# Altium PCB Turret.PcbDoc
Units mm, origin at the board's own origin, x right, y up, seen from the top; angles counter-clockwise.
Board outline 80 x 80 mm, 4 copper layers (Top Layer, Layer 1, Layer 2, Bottom Layer), stack 1.564 mm thick; 100 components, 62 nets, 314 pads, 133 vias.
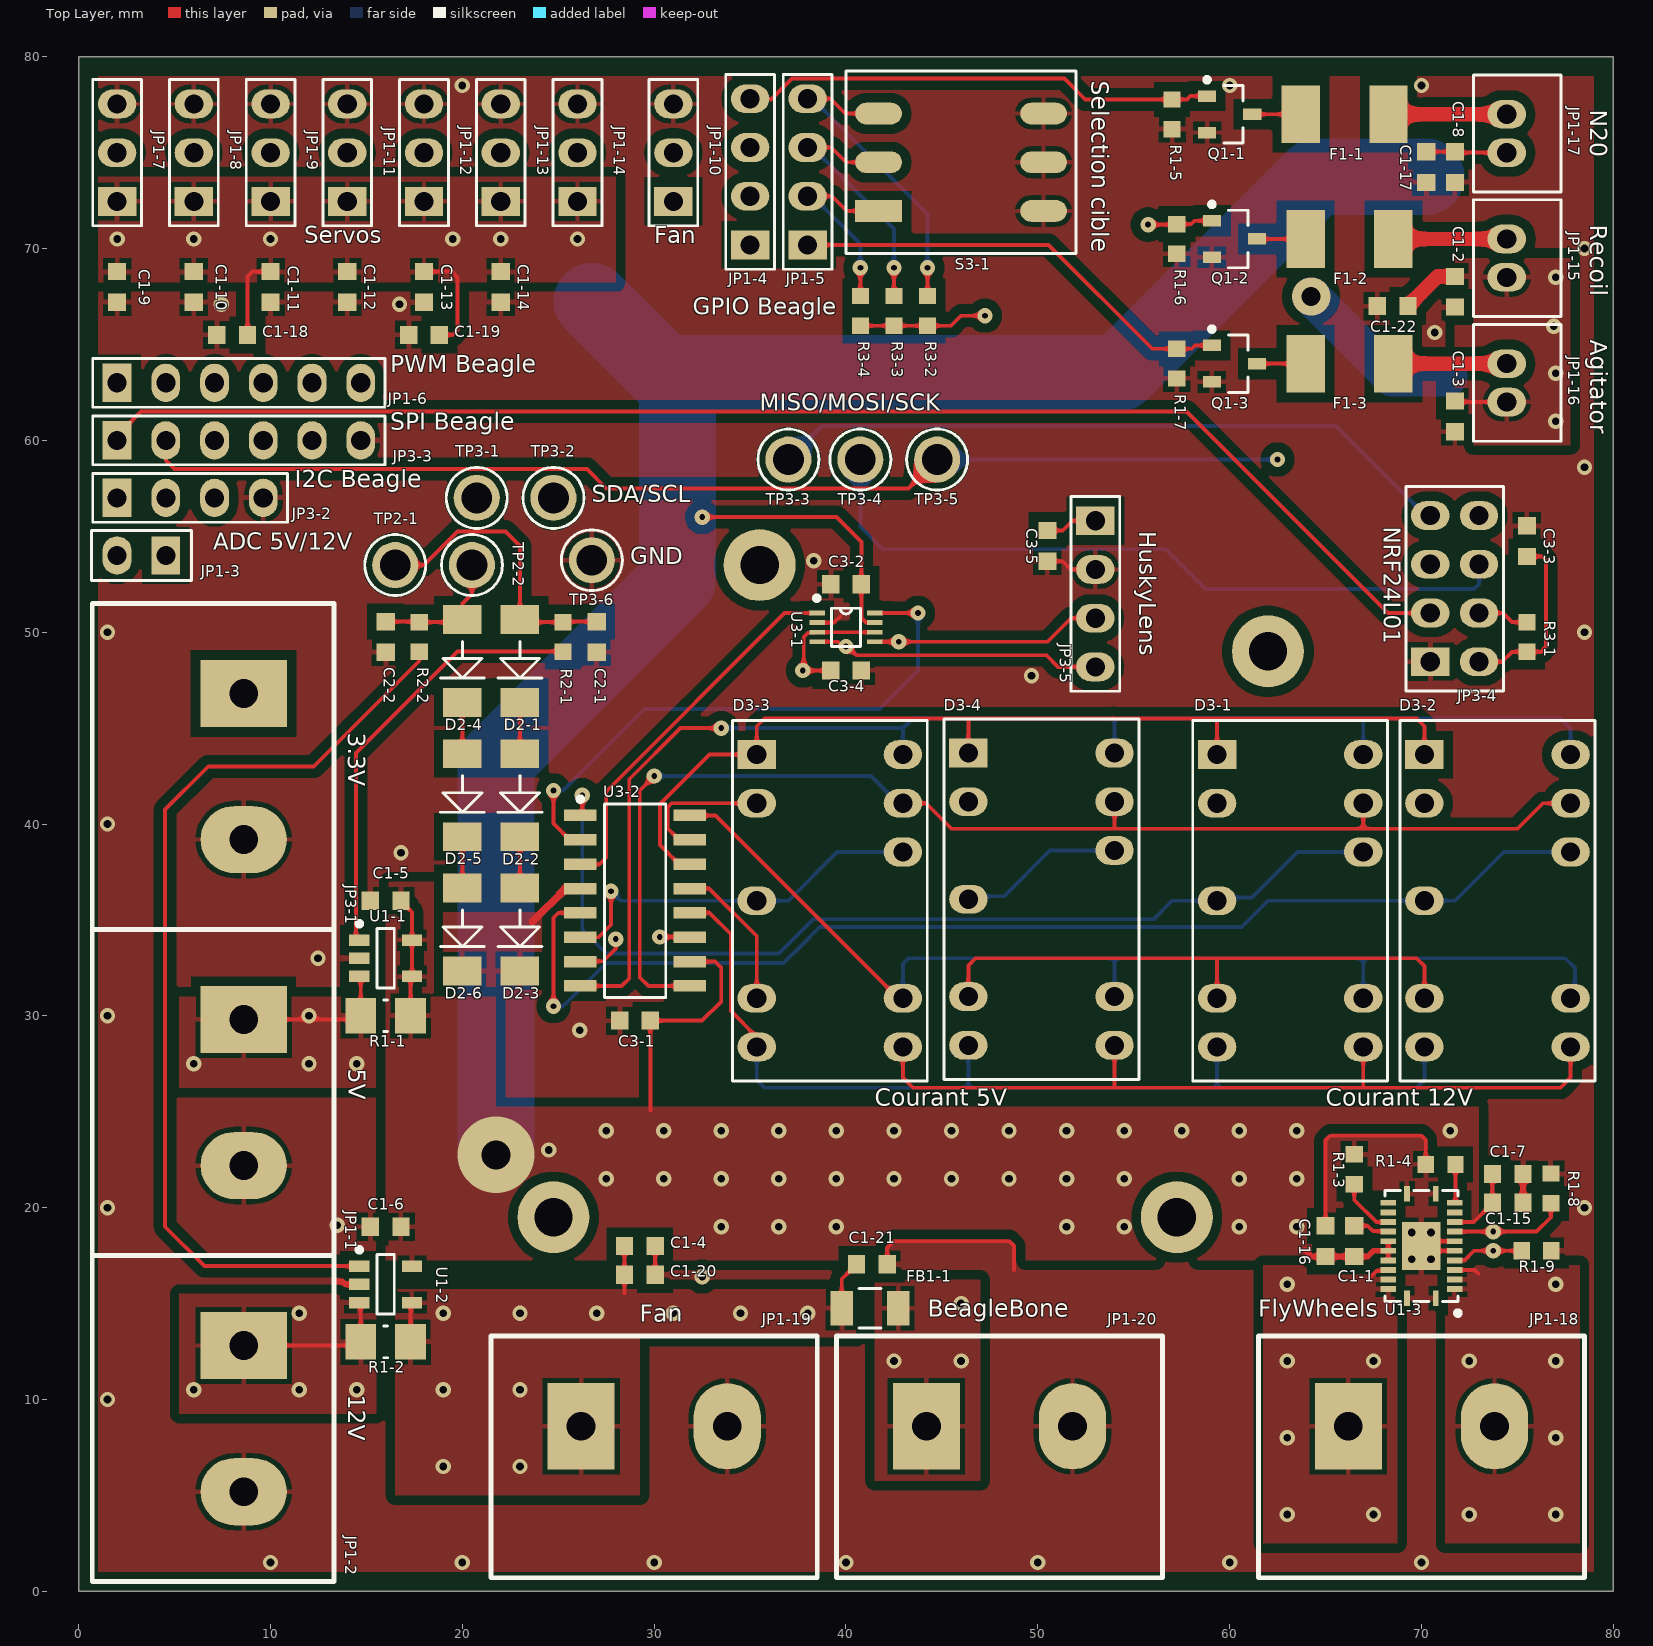
[diagram p0: Top Layer view]
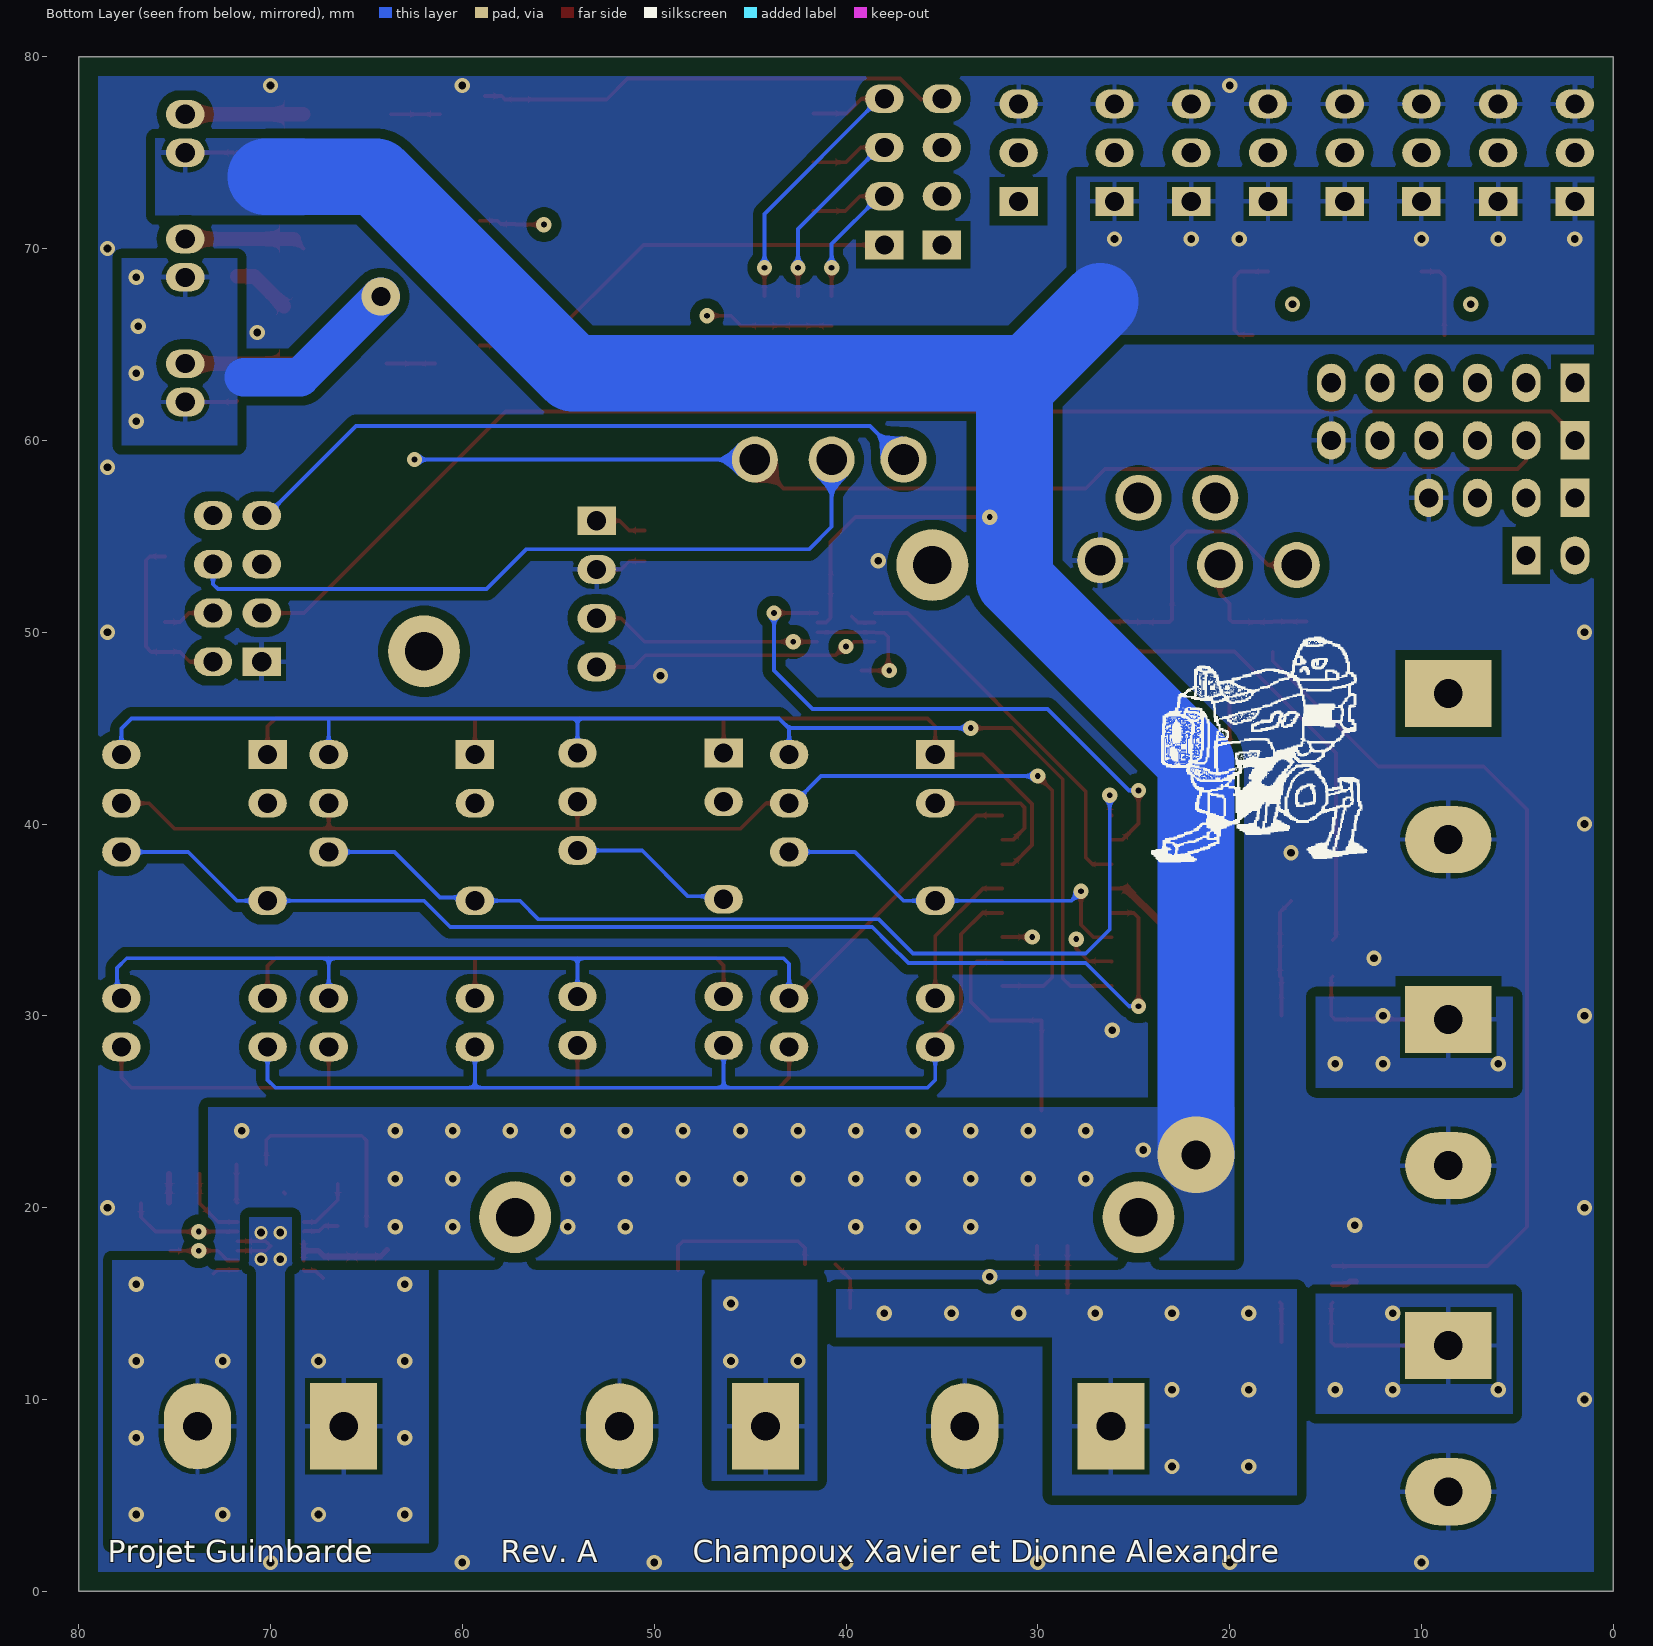
[diagram p1: Bottom Layer view, seen from below]
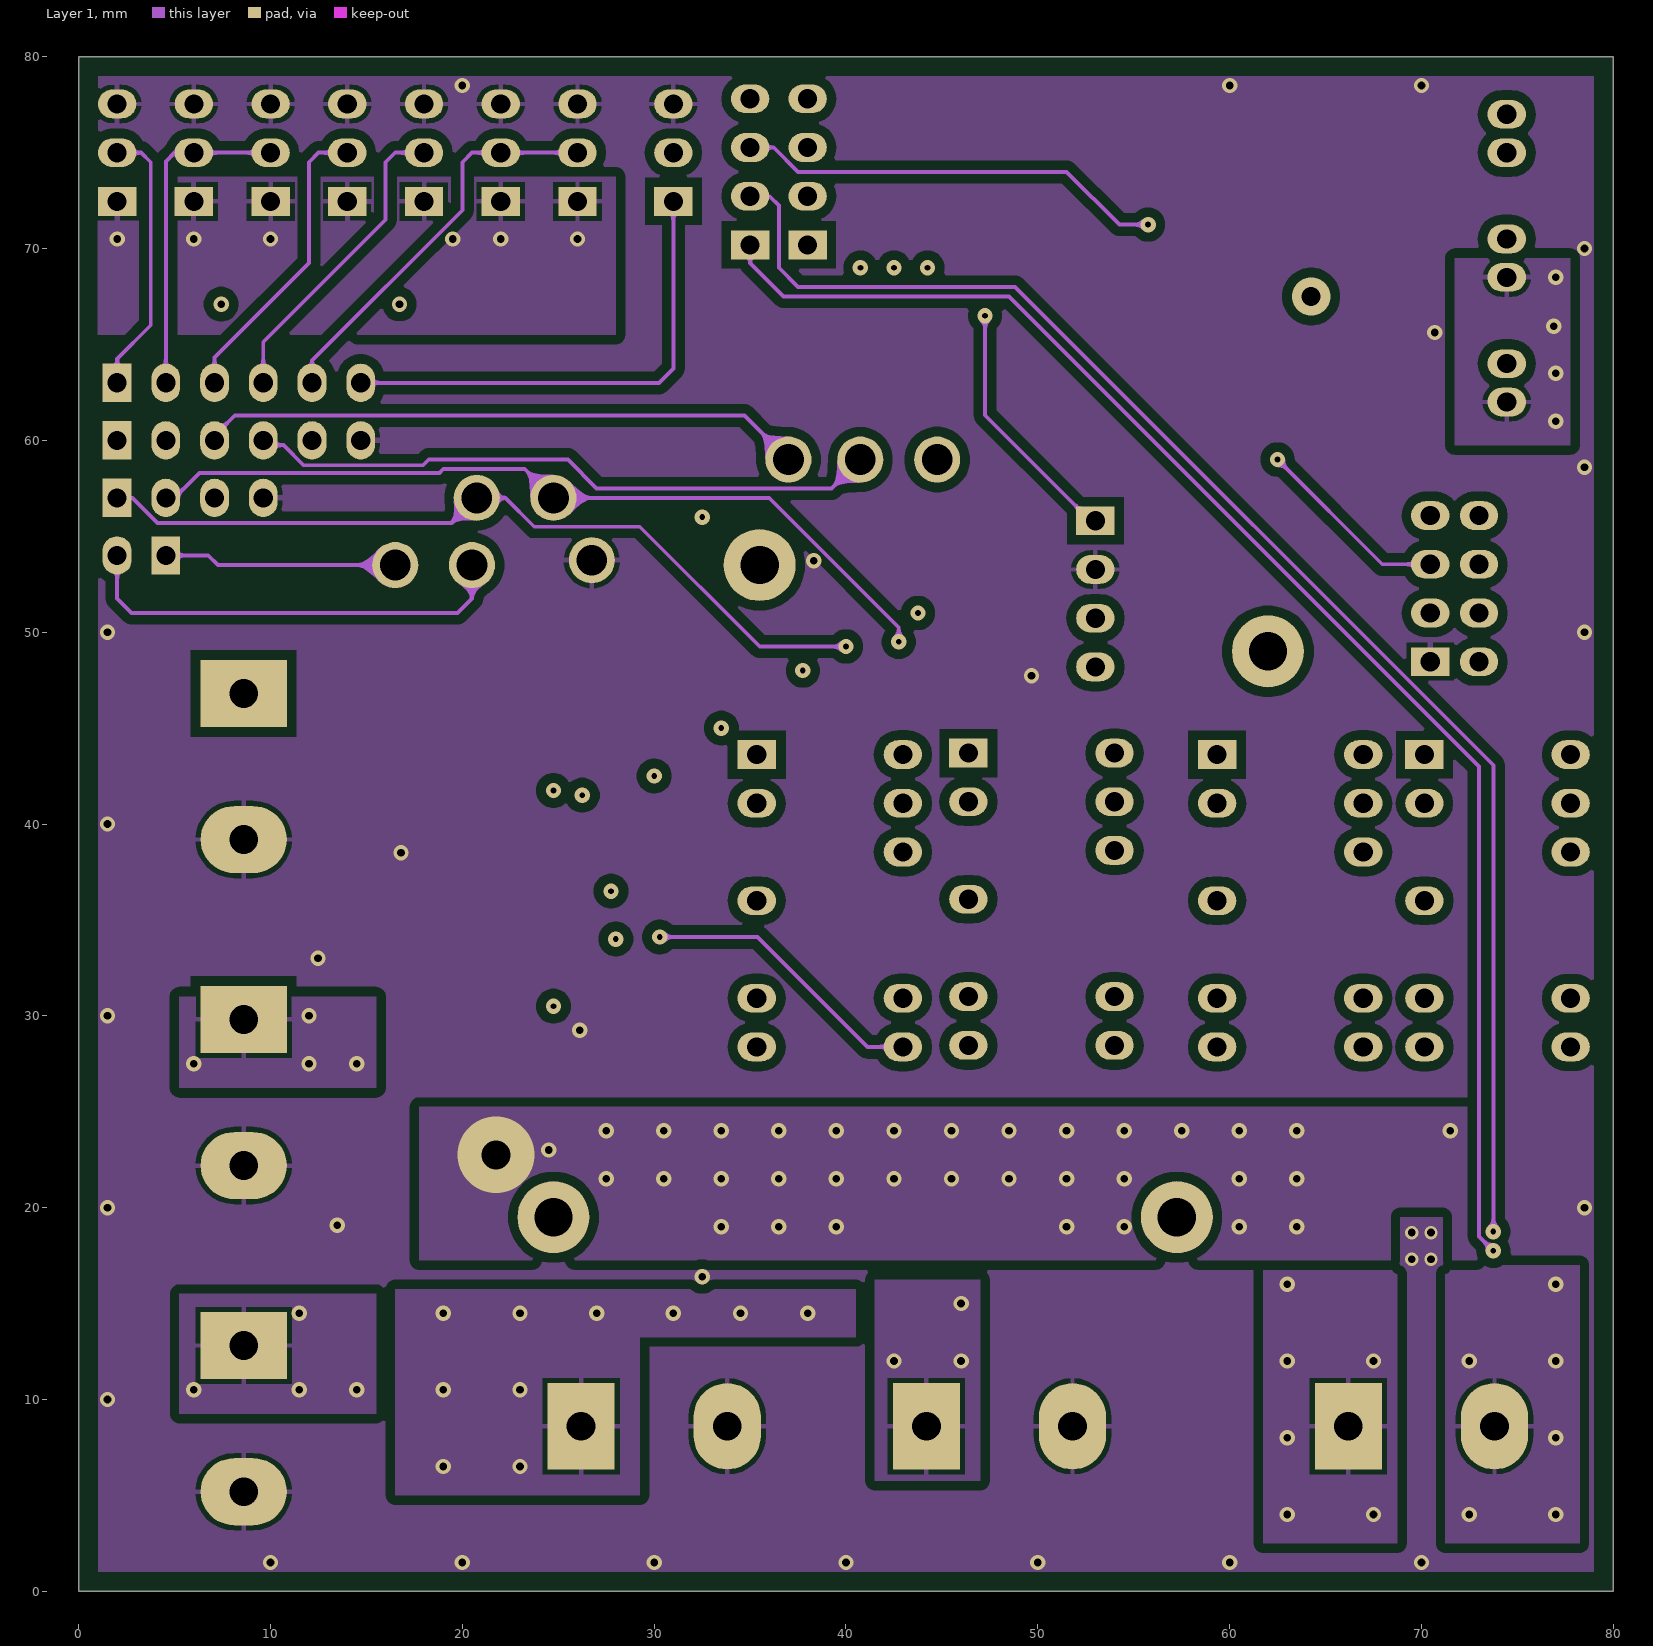
[diagram p2: Layer 1]
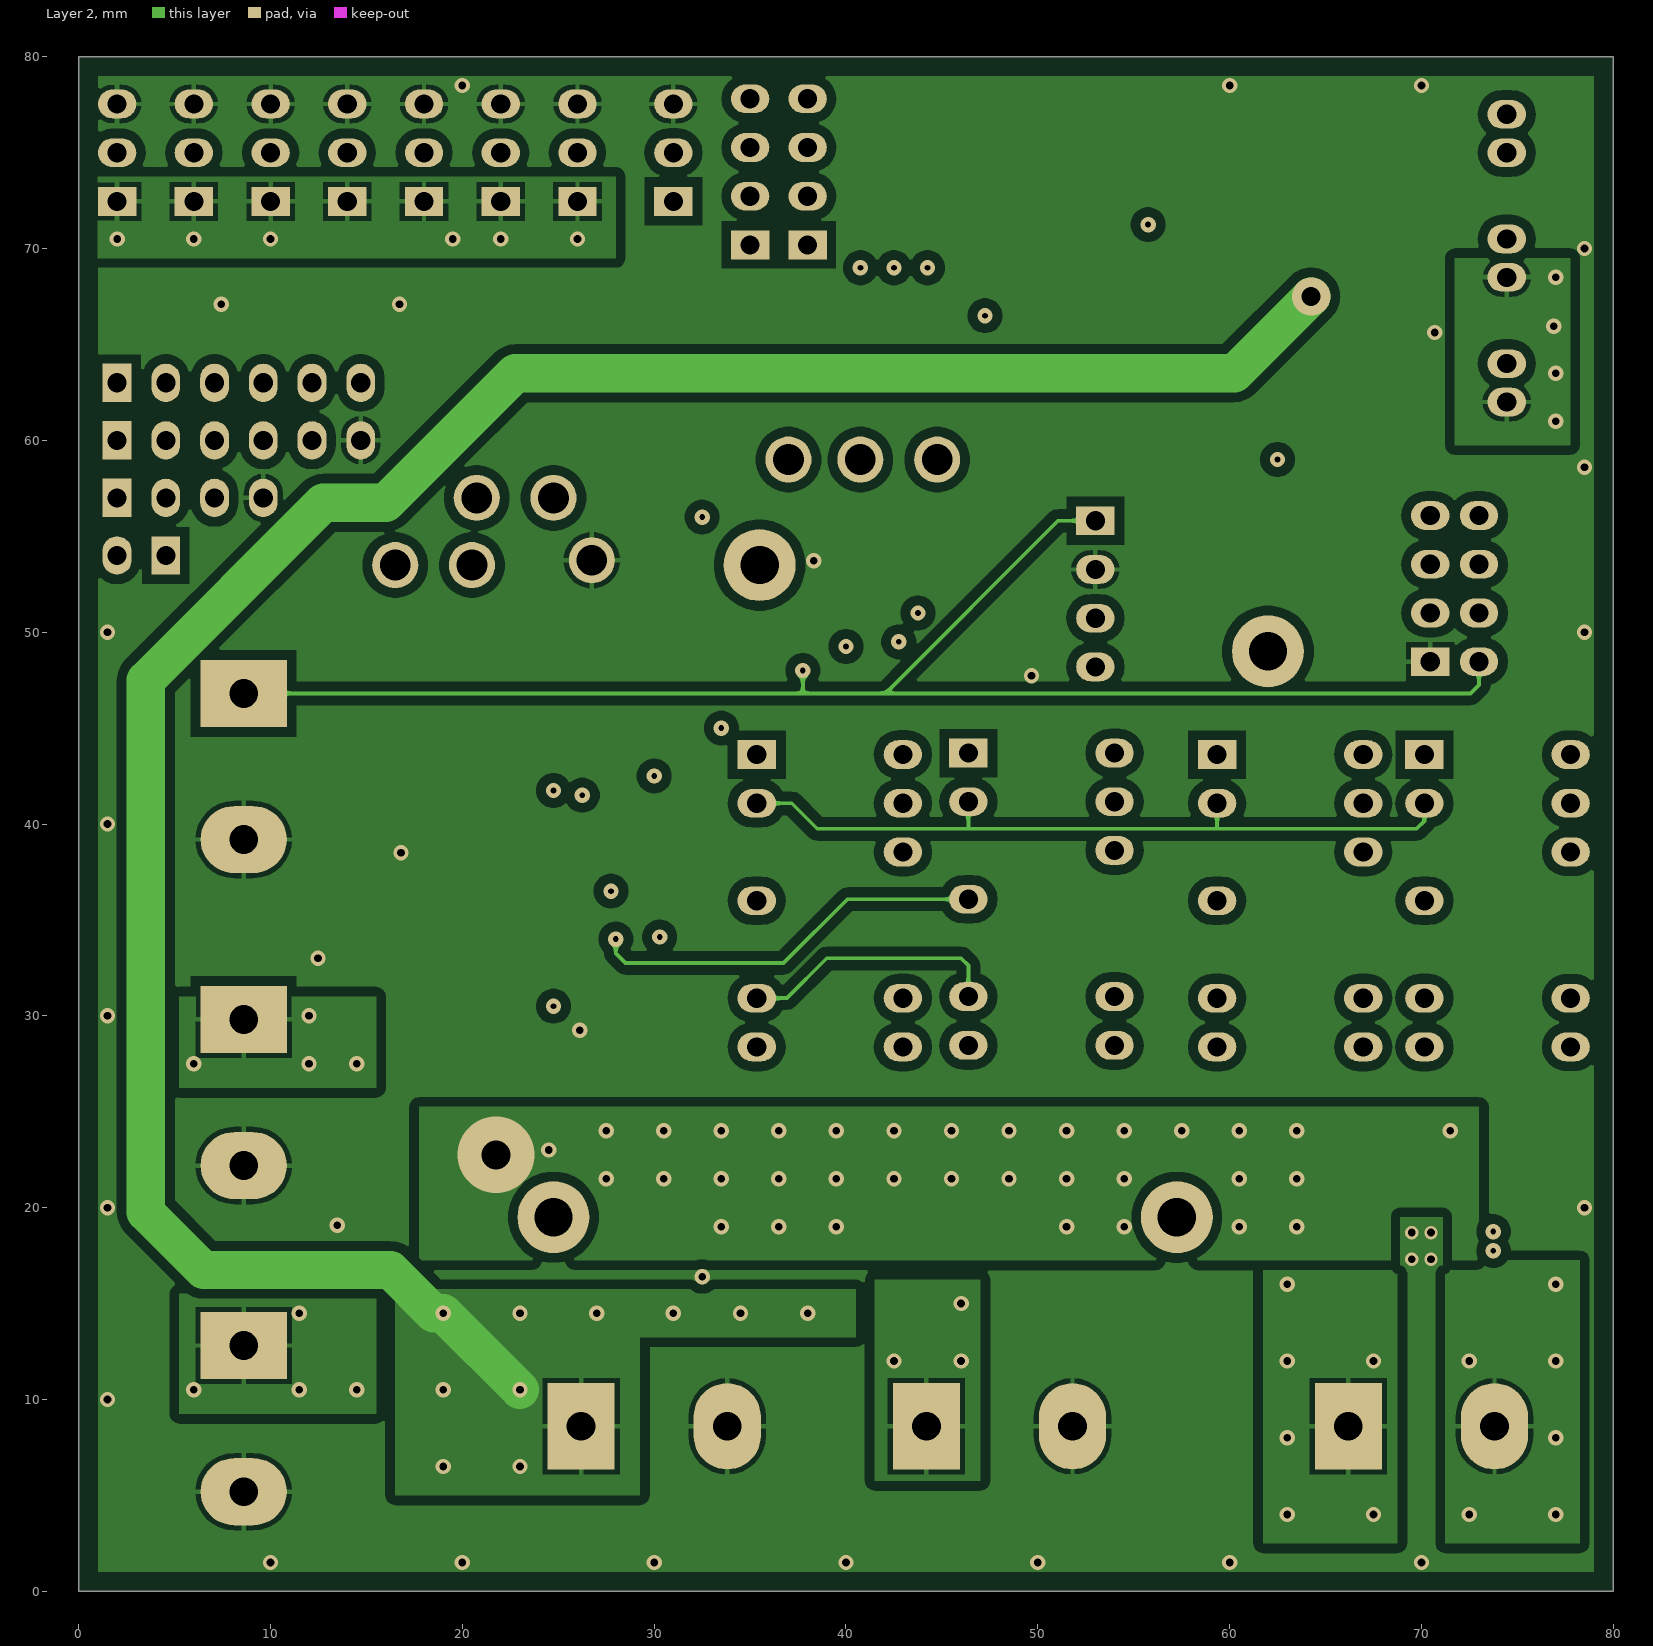
[diagram p3: Layer 2]
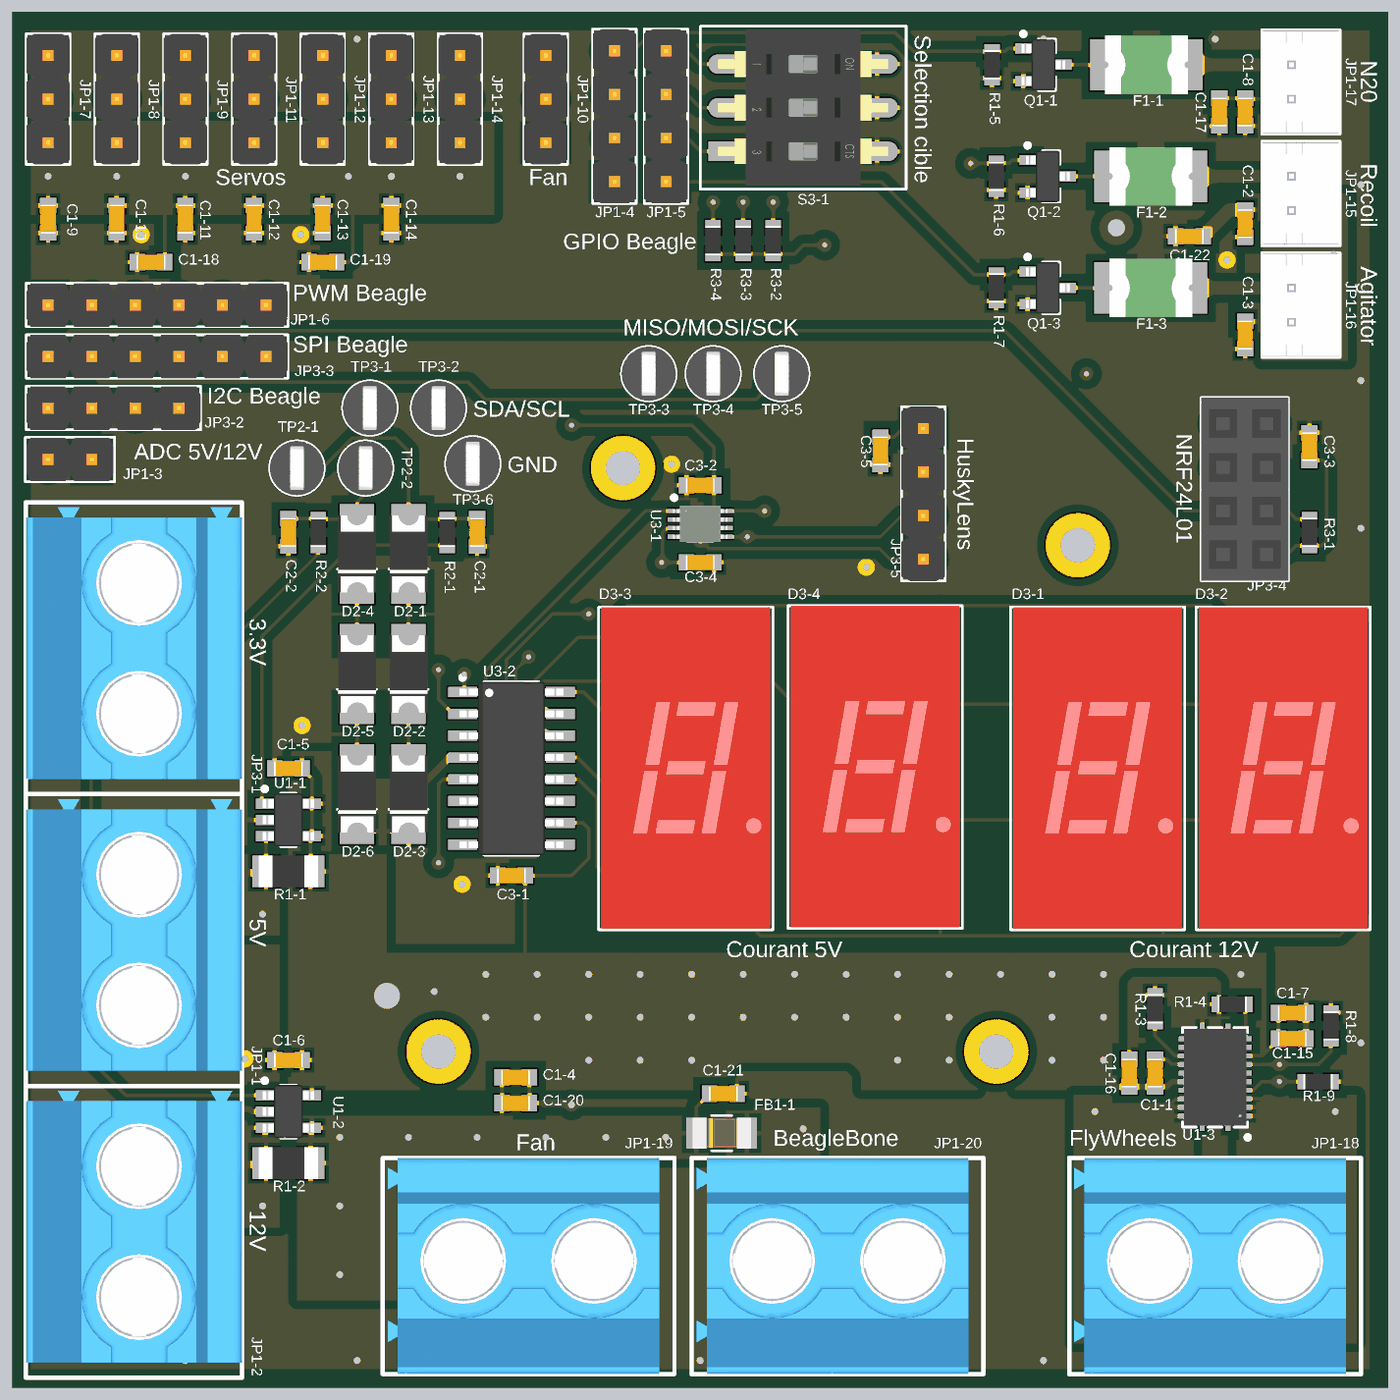
[diagram p4: 3D render of the assembled board from above, using the file's embedded part models]

## Layer stack, top to bottom
Top Solder: solder mask 0.0254, SM-001, Dk 4
Top Layer: signal copper 0.035
Dielectric 2: prepreg 0.0994, PP-006, Dk 4.1
Layer 1: signal copper 0.0152
Dielectric 1: core 1.265, Core-043, Dk 4.3
Layer 2: signal copper 0.0152
Dielectric 3: prepreg 0.0994, PP-006, Dk 4.1
Bottom Layer: signal copper 0.035
Bottom Solder: solder mask 0.0254, SM-001, Dk 4

## Board outline
0,0 80,0 80,80 0,80

## Design rules (kind name [scope] priority, off if disabled: settings)
BoardOutlineClearance [All] p1: gap=1 ignorepadtopadclearanceinfootprint=FALSE except(0.2: Arc-OutlineEdge Arc-CavityEdge Arc-CutoutEdge Arc-SplitBarrior Arc-SplitContinuation Track-OutlineEdge Track-CavityEdge Track-CutoutEdge Track-SplitBarrior Track-SplitContinuation Text-OutlineEdge)
Clearance Clearance_1 [InPoly] p1: gap=0.5 ignorepadtopadclearanceinfootprint=FALSE
Clearance [All] p2: gap=0.15 ignorepadtopadclearanceinfootprint=FALSE
DiffPairsRouting [All] p1: maxlimit=0.125 minlimit=0.125 mostfreqgap=0.125 toplayer_minwidth=0.125 toplayer_maxwidth=0.125 toplayer_prefwidth=0.125 midlayer1_minwidth=0.125 midlayer1_maxwidth=0.125 midlayer1_prefwidth=0.125 midlayer2_minwidth=0.125 midlayer2_maxwidth=0.125 midlayer2_prefwidth=0.125 bottomlayer_minwidth=0.125 bottomlayer_maxwidth=0.125 bottomlayer_prefwidth=0.125 maxuncoupledlength=15
HoleSize [All] p1: absolutevalues=TRUE maxlimit=5 minlimit=0.2 maxpercent=80.000 minpercent=20.000
HoleToHoleClearance [All] p1: gap=0.3 allowstackedmicrovias=TRUE
MinimumSolderMaskSliver [All] p1: minsoldermaskwidth=0.075
PlaneClearance [All] p1: clearance=0.5
PlaneConnect [All] p1: pad.planeconnectstyle=Relief pad.reliefexpansion=0.508 pad.reliefentries=4 pad.reliefconductorwidth=0.254 pad.reliefairgap=0.254 via.planeconnectstyle=Direct via.reliefexpansion=0.508 via.reliefentries=4 via.reliefconductorwidth=0.254 via.reliefairgap=0.254
PolygonConnect [All] p1: thpad.connectstyle=Relief thpad.reliefconductorwidth=0.254 thpad.reliefentries=4 thpad.polygonreliefangle="90 Angle" thpad.airgapwidth=0.254 smdpad.connectstyle=Relief smdpad.reliefconductorwidth=0.254 smdpad.reliefentries=4 smdpad.polygonreliefangle="90 Angle" smdpad.airgapwidth=0.254 via.connectstyle=Direct via.reliefconductorwidth=0.254 via.reliefentries=4 via.polygonreliefangle="90 Angle" via.airgapwidth=0.254
RoutingVias [All] p1: holewidth=0.3 width=0.8 viastyle="Through Hole" minholewidth=0.2 minwidth=0.6 maxholewidth=0.7 maxwidth=1.2
SilkToSilkClearance [All] p1: silktosilkclearance=0
SilkToSolderMaskClearance [IsPad] p1: minsilkscreentomaskgap=0 clearancetoexposedcopper=TRUE
SolderMaskExpansion [All] p1: expansion=0.102 istentingtop=FALSE
SupplyNets "Schematic Supply Nets_3" [InNet('3.3V')] p1: voltage=0.000
SupplyNets "Schematic Supply Nets_2" [InNet('5V')] p2: voltage=0.000
SupplyNets "Schematic Supply Nets_1" [InNet('12V')] p3: voltage=0.000
SupplyNets "Schematic Supply Nets" [InNet('GND')] p4: voltage=0.000
Width [All] p1: maxlimit=5 minlimit=0.15 preferedwidth=0.2
22 further rules are at their usual default settings.

## Classes and differential pairs
component class "PCB Projet Guimbarde Protection_ADC": C2-1 C2-2 D2-1 D2-2 D2-3 D2-4 D2-5 D2-6 R2-1 R2-2 TP2-1 TP2-2
component class "PCB Projet Guimbarde Power": C1-1 C1-2 C1-3 C1-4 C1-5 C1-6 C1-7 C1-8 C1-9 C1-10 C1-11 C1-12 C1-13 C1-14 C1-15 C1-16 C1-17 C1-18 C1-19 C1-20 C1-21 C1-22 F1-1 F1-2 F1-3 FB1-1 JP1-1 JP1-2 JP1-3 JP1-4 JP1-5 JP1-6 JP1-7 JP1-8 JP1-9 JP1-10 JP1-11 JP1-12 JP1-13 JP1-14 JP1-15 JP1-16 JP1-17 JP1-18 JP1-19 JP1-20 Q1-1 Q1-2 Q1-3 R1-1 R1-2 R1-3 R1-4 R1-5 R1-6 R1-7 R1-8 R1-9 U1-1 U1-2 U1-3
component class "PCB Projet Guimbarde Logic": C3-1 C3-2 C3-3 C3-4 C3-5 D3-1 D3-2 D3-3 D3-4 JP3-1 JP3-2 JP3-3 JP3-4 JP3-5 R3-1 R3-2 R3-3 R3-4 S3-1 TP3-1 TP3-2 TP3-3 TP3-4 TP3-5 TP3-6 U3-1 U3-2

## Components (designator, comment, footprint, x,y, rotation, side; value= is the part's Value field where it differs from the comment)
C1-1 "100nF" CAP_0603 66.5,18.25 r90 top
C1-2 "100nF" CAP_0603 71.75,67.75 r270 top
C1-3 "100nF" CAP_0603 71.75,61.25 r270 top
C1-4 "100nF" CAP_0603 29.25,18 r0 top
C1-5 "100nF" CAP_0603 16,36 r180 top
C1-6 "100nF" CAP_0603 16,19 r180 top
C1-7 "100nF" CAP_0603 74.5,21.75 r0 top
C1-8 "100nF" CAP_0603 71.75,74.25 r270 top
C1-9 "100nF" CAP_0603 2,68 r270 top
C1-10 "100nF" CAP_0603 6,68 r270 top
C1-11 "100nF" CAP_0603 10,68 r270 top
C1-12 "100nF" CAP_0603 14,68 r270 top
C1-13 "100nF" CAP_0603 18,68 r270 top
C1-14 "100nF" CAP_0603 22,68 r270 top
C1-15 "10uF" CAP_0603 74.5,20.25 r0 top
C1-16 "10uF" CAP_0603 65,18.25 r90 top
C1-17 "10uF" CAP_0603 70.25,74.25 r270 top
C1-18 "10uF" CAP_0603 8,65.5 r180 top
C1-19 "10uF" CAP_0603 18,65.5 r180 top
C1-20 "10uF" CAP_0603 29.25,16.5 r0 top
C1-21 "10uF" CAP_0603 41.346,17.046 r0 top
C1-22 "10uF" CAP_0603 68.5,67 r180 top
C2-1 "3.3uF" CAP_0603 27,49.75 r270 top
C2-2 "3.3uF" CAP_0603 16,49.75 r270 top
C3-1 "100nF" CAP_0603 29,29.75 r180 top
C3-2 "100nF" CAP_0603 40,52.5 r180 top
C3-3 "100nF" CAP_0603 75.5,54.75 r90 top
C3-4 "100nF" CAP_0603 40,48 r0 top
C3-5 "100nF" CAP_0603 50.5,54.5 r270 top
D2-1 "DIODE" CD214A-B160R 23,48.5 r270 top
D2-2 "DIODE" CD214A-B160R 23,41.5 r270 top
D2-3 "DIODE" CD214A-B160R 23,34.5 r270 top
D2-4 "DIODE" CD214A-B160R 20,48.5 r270 top
D2-5 "DIODE" CD214A-B160R 20,41.5 r270 top
D2-6 "DIODE" CD214A-B160R 20,34.5 r270 top
D3-1 "LTS-315AHR" LTS-315AHR 63.156,36 r0 top
D3-2 "LTS-315AHR" LTS-315AHR 73.966,36 r0 top
D3-3 "LTS-315AHR" LTS-315AHR 39.156,36 r0 top
D3-4 "LTS-315AHR" LTS-315AHR 50.19,36.08 r0 top
F1-1 "RUEF110S" MINISMDC110F/24-2 66,77 r0 top
F1-2 "RUEF110S" MINISMDC110F/24-2 66.25,70.5 r0 top
F1-3 "RUEF110S" MINISMDC110F/24-2 66.25,64 r0 top
FB1-1 "120R * 100MHz" MFBM1V3216-121-R 41.25,14.75 r0 top
JP1-1 "TERMINAL BLOCK" TB005-762-02BE 7,26 r270 top
JP1-2 "TERMINAL BLOCK" TB005-762-02BE 7,9 r270 top
JP1-3 "HEADER 2" Header_2 3.27,54 r180 top
JP1-4 "HEADER 4" Header_4 35,74 r90 top
JP1-5 "HEADER 4" Header_4 38,74 r90 top
JP1-6 "HEADER 6" Header_6 8.35,63 r0 top
JP1-7 "HEADER 3" Header_3 2,75 r90 top
JP1-8 "HEADER 3" Header_3 6,75 r90 top
JP1-9 "HEADER 3" Header_3 10,75 r90 top
JP1-10 "HEADER 3" Header_3 31,75 r90 top
JP1-11 "HEADER 3" Header_3 14,75 r90 top
JP1-12 "HEADER 3" Header_3 18,75 r90 top
JP1-13 "HEADER 3" Header_3 22,75 r90 top
JP1-14 "HEADER 3" Header_3 26,75 r90 top
JP1-15 "JST" B2B-PH-K-S 75,69.5 r90 top
JP1-16 "JST" B2B-PH-K-S 75,63 r90 top
JP1-17 "JST" B2B-PH-K-S 75,76 r90 top
JP1-18 "TERMINAL BLOCK" TB005-762-02BE 70,7 r0 top
JP1-19 "TERMINAL BLOCK" TB005-762-02BE 30,7 r0 top
JP1-20 "TERMINAL BLOCK" TB005-762-02BE 48,7 r0 top
JP3-1 "TERMINAL BLOCK" TB005-762-02BE 7,43 r270 top
JP3-2 "HEADER 4" Header_4 5.81,57 r0 top
JP3-3 "HEADER 6" Header_6 8.35,60 r0 top
JP3-4 "HEADER 4X2" Header_2x4 71.73,52.27 r90 top
JP3-5 "HEADER 4" Header_4 53,52 r270 top
Q1-1 "MOSFET N GSD" GSFC2312 60,77 r0 top
Q1-2 "MOSFET N GSD" GSFC2312 60.25,70.5 r0 top
Q1-3 "MOSFET N GSD" GSFC2312 60.25,64 r0 top
R1-1 "1m" RES_1206 16,30 r0 top
R1-2 "1m" RES_1206 16,13 r0 top
R1-3 "1k6" RES_0603 66.5,22 r90 top
R1-4 "24k" RES_0603 71,22.25 r0 top
R1-5 "4k7" RES_0603 57,77 r90 top
R1-6 "4k7" RES_0603 57.25,70.5 r90 top
R1-7 "4k7" RES_0603 57.25,64 r90 top
R1-8 "4k7" RES_0603 76.75,21 r270 top
R1-9 "4k7" RES_0603 76,17.75 r180 top
R2-1 "1k" RES_0603 25.25,49.75 r90 top
R2-2 "1k" RES_0603 17.75,49.75 r90 top
R3-1 "4k7" RES_0603 75.5,49.75 r270 top
R3-2 "4k7" RES_0603 44.25,66.75 r90 top
R3-3 "4k7" RES_0603 42.5,66.75 r90 top
R3-4 "4k7" RES_0603 40.75,66.75 r90 top
S3-1 "SW DIP-3" 219-3LPST 46,74.5 r90 top
TP2-1 "5006" TestPoint 16.5,53.5 r90 top
TP2-2 "5006" TestPoint 20.5,53.5 r90 top
TP3-1 "5006" TestPoint 20.75,57 r90 top
TP3-2 "5006" TestPoint 24.75,57 r90 top
TP3-3 "5006" TestPoint 37,59 r90 top
TP3-4 "5006" TestPoint 40.75,59 r90 top
TP3-5 "5006" TestPoint 44.75,59 r90 top
TP3-6 "5006" TestPoint 26.75,53.75 r90 top
U1-1 "ZXCT180A4W5-7" ZXCT180A4W5-7 16,33 r0 top
U1-2 "ZXCT180A4W5-7" ZXCT180A4W5-7 16,16 r0 top
U1-3 "DRV8850RGYR" DRV8850 70,18 r180 top
U3-1 "TCA9406" TCA9406 40,50.25 r0 top
U3-2 "ET6226M" ET6226M 29,36 r0 top

## Footprints (in the part's own frame and the unit in brackets; to place one, negate y for a bottom-side part, rotate by r counter-clockwise, add the part's x,y. Pads: shape width x height; smd on the part's side, far side on the other; paste and mask are expansions set on the pad)
219-3LPST [mm]
  rect 1.13x2.44 smd: 1(-2.54,4.3)
  oval 1.13x2.44 smd: 2(0,4.3) 3(2.54,4.3) 4(-2.54,-4.3) 5(0,-4.3) 6(2.54,-4.3)
  silkscreen extent -4.75,-6 4.75,6, body extent -4.54,-4.95 4.54,4.95, height 4.3
B2B-PH-K-S [mm]
  oval 1.5x2 hole 1 paste-2539.97 mask+0: 1(-1,0.55) 2(1,0.55)
  silkscreen extent -3.05,-2.29 3.05,2.29, body extent -2.95,-2.25 2.95,2.25, height 6
CAP_0603 [mm]
  rect 0.9x0.95 smd: 1(-0.8,0) 2(0.8,0)
  body extent -0.85,-0.45 0.85,0.45, height 0.55
CD214A-B160R [mm]
  rect 1.5x2 smd: 1(-2.159,0) 2(2.159,0)
  silkscreen extent -1.02,-1.14 0.89,1.14, body extent -2.25,-1.1 2.25,1.1, height 1
DRV8850 [mm]
  rect 0.305x0.805 smd mask+0.05: 1(-0.75,2.727) 12(-0.75,-2.727) 13(0.75,-2.727) 24(0.75,2.727)
  rect 2x2.5 smd paste+0 mask+0.05: 1(0,0)
  rect 0.805x0.305 smd mask+0.05: 2(-1.727,2.25) 3(-1.727,1.75) 4(-1.727,1.25) 5(-1.727,0.75) 6(-1.727,0.25) 7(-1.727,-0.25) 8(-1.727,-0.75) 9(-1.727,-1.25) 10(-1.727,-1.75) 11(-1.727,-2.25) 14(1.727,-2.25) 15(1.727,-1.75) 16(1.727,-1.25) 17(1.727,-0.75) 18(1.727,-0.25) 19(1.727,0.25) 20(1.727,0.75) 21(1.727,1.25) 22(1.727,1.75) 23(1.727,2.25)
  silkscreen extent -2.02,-2.9 1.9,3.62, body extent -1.83,-2.83 1.83,2.83, height 1.4
ET6226M [mm] "TSOP, 16-Leads, Body 10,00x3,95mm, Pitch 1,27mm, IPC Medium Density"
  rect 1.7x0.6 smd: 1(-2.85,4.445) 2(-2.85,3.175) 3(-2.85,1.905) 4(-2.85,0.635) 5(-2.85,-0.635) 6(-2.85,-1.905) 7(-2.85,-3.175) 8(-2.85,-4.445) 9(2.85,-4.445) 10(2.85,-3.175) 11(2.85,-1.905) 12(2.85,-0.635) 13(2.85,0.635) 14(2.85,1.905) 15(2.85,3.175) 16(2.85,4.445)
  silkscreen extent -2.97,-5.05 1.6,5.42, body extent -3.02,-5.05 3.02,5.05, height 1.55
GSFC2312 [mm] "SOT23, 3-Leads, Body 2,90x2,40mm, Pitch 0,95mm, IPC Medium Density"
  rect 0.95x0.6 smd: 1(-1.175,0.95) 2(-1.175,-0.95) 3(1.175,0)
  silkscreen extent -1.3,-1.5 0.7,1.92, body extent -1.28,-1.5 1.28,1.5, height 1.15
Header_2 [mm]
  rect 1.5x2 hole 1: 1(-1.27,0)
  oval 1.524x2 hole 1: 2(1.27,0)
  silkscreen extent -2.6,-1.3 2.6,1.3, body extent -2.54,-1.27 2.54,1.27, height 8.54
Header_2x4 [mm]
  rect 1.5x2 hole 1: 1(-3.81,1.27)
  oval 1.5x2 hole 1: 2(-3.81,-1.27) 3(-1.27,1.27) 4(-1.27,-1.27) 5(1.27,1.27) 6(1.27,-1.27) 7(3.81,1.27) 8(3.81,-1.27)
  silkscreen extent -5.33,-2.54 5.33,2.54, body extent -5.33,-2.54 5.33,2.54, height 8.51
Header_3 [mm]
  rect 1.5x2 hole 1: 1(-2.54,0)
  oval 1.5x2 hole 1: 2(0,0) 3(2.54,0)
  silkscreen extent -3.81,-1.27 3.81,1.27, body extent -3.81,-1.27 3.81,1.27, height 8.54
Header_4 [mm]
  rect 1.5x2 hole 1: 1(-3.81,0)
  oval 1.5x2 hole 1: 2(-1.27,0) 3(1.27,0) 4(3.81,0)
  silkscreen extent -5.08,-1.27 5.08,1.27, body extent -5.08,-1.28 5.08,1.26, height 8.54
Header_6 [mm]
  rect 1.5x2 hole 1: 1(-6.35,0)
  oval 1.5x2 hole 1: 2(-3.81,0) 3(-1.27,0) 4(1.27,0) 5(3.81,0) 6(6.35,0)
  silkscreen extent -7.62,-1.27 7.62,1.27, body extent -7.62,-1.27 7.62,1.27, height 8.54
LTS-315AHR [mm]
  rect 2x1.5 hole 1: 1(-3.81,7.62)
  oval 2x1.5 hole 1: 2(-3.81,5.08) 4(-3.81,0) 6(-3.81,-5.08) 7(-3.81,-7.62) 8(3.81,-7.62) 9(3.81,-5.08) 12(3.81,2.54) 13(3.81,5.08) 14(3.81,7.62)
  silkscreen extent -5.08,-9.4 5.08,9.4, body extent -4.92,-9.35 4.93,9.4, height 5.16
MFBM1V3216-121-R [mil]
  rect 46x71 smd paste+0 mask+0: 1(-58,0) 2(58,0)
  silkscreen extent -23,-40 23,40, body extent -67,-36 67,36, height 43
MINISMDC110F/24-2 [mm]
  rect 2x3 smd: 1(-2.286,0) 2(2.286,0)
  body extent -2.41,-1.71 2.41,1.71, height 1.46
RES_0603 [mm]
  rect 0.85x0.9 smd: 1(-0.775,0) 2(0.775,0)
  body extent -0.85,-0.45 0.85,0.45, height 0.55
RES_1206 [mm] "Chip Resistor, 2-Leads, Body 3,20x1,60mm, IPC Medium Density"
  rect 1.6x1.85 smd: 1(-1.3,0) 2(1.3,0)
  silkscreen extent -0.1,-0.82 0.1,0.82, body extent -1.73,-0.92 1.73,0.92, height 0.9
TB005-762-02BE [mm]
  rect 3.5x4.5 hole 1.5: 1(-3.81,1.6)
  oval 3.5x4.5 hole 1.5: 2(3.81,1.6)
  silkscreen extent -8.5,-6.3 8.5,6.3, body extent -8.22,-6.3 7.62,6.3, height 21.7
TCA9406 [mm]
  rect 0.8x0.254 smd: 1(-1.5,0.75) 2(-1.5,0.25) 3(-1.5,-0.25) 4(-1.5,-0.75) 5(1.5,-0.75) 6(1.5,-0.25) 7(1.5,0.25) 8(1.5,0.75)
  silkscreen extent -1.65,-1 0.75,1.65, body extent -1.6,-1.05 1.6,1.05, height 0.89
TestPoint [mm]
  round 2.4 hole 1.6: 1(0,0)
  silkscreen extent -1.59,-1.59 1.59,1.59, body extent -1.59,-1.59 1.59,1.59, height 5.59
ZXCT180A4W5-7 [mm] "SOT23, 5-Leads, Body 3,00x2,85mm, Pitch 0,95mm, IPC Medium Density"
  rect 1.05x0.6 smd: 1(-1.375,0.95) 2(-1.375,0) 3(-1.375,-0.95) 4(1.375,-0.95) 5(1.375,0.95)
  silkscreen extent -1.5,-1.55 0.45,1.92, body extent -1.5,-1.55 1.5,1.55, height 1.3

## Part data
C1-1 C1-2 C1-3 C1-4 C1-5 C1-6 C1-7 C1-8 C1-9 C1-10 C1-11 C1-12 C1-13 C1-14 C1-15 C1-16 C1-17 C1-18 C1-19 C1-20 C1-21 C1-22 C2-1 C2-2 C3-1 C3-2 C3-3 C3-4 C3-5: library part "CAP NP"
F1-1 F1-2 F1-3: library part Polyswitch
FB1-1: library part Ferrite
JP1-1 JP1-2 JP1-15 JP1-16 JP1-17 JP1-18 JP1-19 JP1-20 JP3-1: library part "HEADER 2"
R1-1 R1-2 R1-3 R1-4 R1-5 R1-6 R1-7 R1-8 R1-9 R2-1 R2-2 R3-1 R3-2 R3-3 R3-4: library part R
TP2-1 TP2-2 TP3-1 TP3-2 TP3-3 TP3-4 TP3-5 TP3-6: library part Test_Point
U1-3: "No Description Available", Mfr_Name="Texas Instruments", RefDes=RefDes, Type=Type

## Free pads (board coordinates)
  round 3.75 hole 2: 1(24.75,19.5) 1(35.5,53.5) 1(57.25,19.5) 1(62,49)

## Via types
v1: diameter 0.8, hole 0.4, Top Layer to Bottom Layer, tented both sides, 97 vias
v2: diameter 0.8, hole 0.3, Top Layer to Bottom Layer, tented both sides, 21 vias
v3: diameter 0.8, hole 0.4, Top Layer to Bottom Layer, 9 vias
v4: diameter 0.7, hole 0.4, Top Layer to Bottom Layer, tented bottom, 4 vias
v5: diameter 4, hole 1.5, Top Layer to Bottom Layer, tented both sides, 1 vias
v6: diameter 2, hole 1, Top Layer to Bottom Layer, tented both sides, 1 vias

## Nets (pads, with @x,y where several pads share a name; then routed paths per layer and width w, separated by ;. In a path a pad name is that pad's centre, name@x,y a point inside that pad or via, vN(x,y) a via of type N, cw(c..) or ccw(c..) an arc to the next point about the centre after c; other vN are vias at no path point)
3.3V: C3-3.1 C3-4.1 C3-5.1 JP3-1.1 JP3-4.2 JP3-5.1 R3-1.2 R3-2.1 R3-3.1 R3-4.1 U3-1.3 U3-1.6 | length 120.3
  Top Layer w0.2: v2@37.8,48.2 37.8,49.751 38.022,49.973 38.473,49.973 U3-1.3 U3-1.6 ; v2@38,48 C3-4.1 ; R3-4.1 R3-3.1 R3-2.1 45.475,65.975 46,66.5 v2(47.25,66.5) ; C3-5.1 51.3,55.3 51.81,55.81 JP3-5.1 ; JP3-4.2 74.21,48.46 74.725,48.975 R3-1.2 76.225,48.975 76.5,49.25 76.5,53.75 76.3,53.95 C3-3.1
  Layer 1 w0.2: v2(47.25,66.5) 47.25,61.31 52.75,55.81 JP3-5.1
  Layer 2 w0.2: JP3-1.1 37.75,46.81 ; v2(37.75,48) 37.75,46.81 ; JP3-5.1 51.06,55.81 42.06,46.81 ; JP3-4.2 73,47.25 72.56,46.81 42.06,46.81 ; 37.75,46.81 42.06,46.81
5V: C1-1.1 C1-5.1 C1-6.1 C1-7.1 C1-8.1 C1-9.1 C1-10.1 C1-11.1 C1-12.1 C1-13.1 C1-14.1 C1-15.1 C1-16.1 C1-17.1 C1-18.1 C1-19.1 C3-1.1 C3-2.1 JP1-7.1 JP1-8.1 JP1-9.1 JP1-11.1 JP1-12.1 JP1-13.1 JP1-14.1 JP1-17.1 R1-1.2 U1-1.4 U1-1.5 U1-2.5 U1-3.9 U1-3.18 U1-3.19 U1-3.20 U3-1.7 U3-2.10 | length 149.8
  Top Layer w0.2: C1-18.1 8.8,68.55 9.05,68.8 C1-11.1 ; C1-5.1 16.8,35.975 17.375,35.4 U1-1.5 U1-1.4 17.3,31.975 R1-1.2 ; C1-13.1 19.45,68.8 19.75,68.5 19.75,65.75 19.5,65.5 C1-19.1 ; 29.8,25.05 C3-1.1 32.5,29.75 33.5,30.75 33.5,32.5 33.175,32.825 U3-2.10 ; v2(32.5,56) 39.5,56 40.8,54.7 C3-2.1 40.8,51.437 40.8,50.749 41.049,50.5 U3-1.7 ; U1-3.20 U1-3.19 U1-3.18 ; C1-17.1 C1-8.1 ; U1-3.9 72.725,19.25 73.7,20.225 C1-15.1 C1-7.1 ; C1-8.1@71.75,74.8 71.95,75 JP1-17.1
  Top Layer w0.3: 63.925,17.8 64.275,17.45 C1-16.1 C1-1.1 67.2,17.45 67.5,17.75 U1-3.19
  Layer 2 w1: JP1-14.1 JP1-14.1@26.25,72.46
  Bottom Layer w4: v5(21.75,22.75) 21.75,43.25 31.21,52.71 31.21,62.79 26.75,67.25 ; 31.25,63.5 54.25,63.5 64.5,73.75 70.25,73.75
  other v1: 33.5,19 36.5,19 39.5,19 51.5,19 54.5,19 60.5,19 63.5,19 27.5,21.5 30.5,21.5 33.5,21.5 36.5,21.5 39.5,21.5 42.5,21.5 45.5,21.5 48.5,21.5 51.5,21.5 54.5,21.5 60.5,21.5 63.5,21.5 24.5,23 27.5,24 30.5,24 33.5,24 36.5,24 39.5,24 42.5,24 45.5,24 48.5,24 51.5,24 54.5,24 57.5,24 60.5,24 63.5,24 71.5,24 2,70.5 6,70.5 10,70.5 19.5,70.5 22,70.5 26,70.5
12V: C1-2.1 C1-3.1 C1-4.1 C1-20.1 C1-21.1 C1-22.1 FB1-1.1 JP1-15.1 JP1-16.1 JP1-19.1 R1-2.2 U1-2.4 | length 142
  Top Layer w0.2: R1-2.2 17.3,14.975 U1-2.4 ; 28.45,15.55 C1-20.1 C1-4.1 ; FB1-1.1 39.777,16.277 C1-21.1 ; C1-3.1 71.8,62 JP1-16.1
  Top Layer w0.75: C1-22.1 70.85,68.55 C1-2.1
  Layer 2 w2: v1(23,10.5) v1(19,14.5) 18.5,14.5 16.25,16.75 6.5,16.75 3.5,19.75 3.5,47.5 12.75,56.75 16,56.75 22.75,63.5 60.25,63.5 v6(64.25,67.5)
  Bottom Layer w2: v6(64.25,67.5) 68.45,63.3 71.4,63.3
  other v1: 19,6.5 23,6.5 19,10.5 23,14.5 27,14.5 31,14.5 34.5,14.5 38,14.5 77,61 77,63.5 76.9,65.95 77,68.5
ADC5V: C2-1.1 D2-1.1 JP1-3.1 R2-1.2 TP2-1.1 | length 27.6
  Top Layer w0.2: TP2-1.1 18,53.5 19.75,55.25 22.25,55.25 23,54.5 D2-1.1 23.134,50.525 R2-1.2 25.275,50.55 C2-1.1
  Layer 1 w0.2: JP1-3.1 6.75,54 7.25,53.5 TP2-1.1
ADC12V: C2-2.1 D2-4.1 JP1-3.2 R2-2.2 TP2-2.1 | length 30.2
  Top Layer w0.2: C2-2.1 17.725,50.55 R2-2.2 19.866,50.525 D2-4.1 20,51.5 20.5,52 TP2-2.1
  Layer 1 w0.2: JP1-3.2 2,51.75 2.75,51 19.75,51 20.5,51.75 TP2-2.1
Agitator: F1-3.2 JP1-16.2 | length 5.9
  Top Layer w0.75: F1-3.2 JP1-16.2
CNS: JP3-4.4 R3-1.1 | length 2.7
  Top Layer w0.2: JP3-4.4 74.25,51 74.725,50.525 R3-1.1
CS: JP3-3.1 JP3-4.3 | length 73.6
  Top Layer w0.2: JP3-3.1 2,60.25 3.25,61.5 57.75,61.5 68.25,51 JP3-4.3
FlywheelH: JP1-18.2 U1-3.2 U1-3.3 U1-3.4 | length 1.3
  Top Layer w0.2: U1-3.4 72.775,16.75 72.975,16.55
  other v1: 72.5,4 77,4 77,8 72.5,12 77,12 77,16
FlywheelL: JP1-18.1 U1-3.21 U1-3.22 U1-3.23 | length 1.2
  Top Layer w0.2: 67.275,16.325 67.652,16.702 68.225,16.702 U1-3.21
  other v1: 63,4 67.5,4 63,8 63,12 67.5,12 63,16
GND: C1-2.2 C1-3.2 C1-4.2 C1-5.2 C1-6.2 C1-7.2 C1-8.2 C1-9.2 C1-10.2 C1-11.2 C1-12.2 C1-13.2 C1-14.2 C1-15.2 C1-16.2 C1-17.2 C1-18.2 C1-19.2 C1-20.2 C1-21.2 C1-22.2 C2-1.2 C2-2.2 C3-1.2 C3-2.2 C3-3.2 C3-4.2 C3-5.2 D2-3.2 D2-6.2 JP1-1.2 JP1-2.2 JP1-7.3 JP1-8.3 JP1-9.3 JP1-10.3 JP1-11.3 JP1-12.3 JP1-13.3 JP1-14.3 JP1-19.2 JP1-20.2 JP3-1.2 JP3-2.4 JP3-3.6 JP3-4.1 JP3-5.2 Q1-1.2 Q1-2.2 Q1-3.2 R1-3.2 R1-4.1 R1-5.1 R1-6.1 R1-7.1 R1-8.1 R1-9.1 S3-1.4 S3-1.5 S3-1.6 TP3-6.1 U1-1.2 U1-2.2 U1-3.1 U1-3.6 U1-3.7 U1-3.12 U1-3.13 U1-3.24 U3-1.2 U3-2.4 | length 35.2
  Top Layer w0.2: U3-2.4@25.385,36.635 U3-2.4 ; C1-20.2 C1-4.2 ; U3-1.2 39.375,50.5 39.7,50.825 ; C1-21.2 42.146,17.896 42.5,18.25 48.5,18.25 48.75,18 48.75,16.75 ; C3-5.2 51.3,53.7 51.73,53.27 JP3-5.2 ; C1-16.2 65,23.5 65.25,23.75 70,23.75 70.225,23.525 R1-4.1 ; U1-3.13 U1-3.13@69.302,20.78 ; U1-3.1@70,18 70.25,17.75 U1-3.6 ; U1-3.1@70.125,18.125 70.25,18.25 U1-3.7
  Top Layer w0.3: 13.4,16.15 13.741,16.15 13.891,16 U1-2.2 ; C1-15.2 C1-7.2
  Top Layer w0.4: 23.65,34.9 U3-2.4@25.385,36.635
  other v1: 10,1.5 20,1.5 30,1.5 40,1.5 50,1.5 60,1.5 70,1.5 1.5,10 32.5,16.4 1.5,20 78.5,20 1.5,30 1.5,40 1.5,50 78.5,50 78.5,58.6 78.5,70 20,78.5 60,78.5 70,78.5
  other v3: 13.475,19.075 26.125,29.25 12.475,33 16.8,38.5 49.675,47.725 38.325,53.725 70.7,65.625 7.425,67.1 16.725,67.1
  other v4: 69.5,17.3 70.5,17.3 69.5,18.7 70.5,18.7
GPIO1: JP1-4.1 R1-9.2 U1-3.5 | length 79.1
  Top Layer w0.2: U1-3.5 72.25,17.25 72.75,17.75 v2(73.75,17.75) R1-9.2
  Layer 1 w0.2: JP1-4.1 35,69.25 36.75,67.5 48.5,67.5 73,43 73,18.5 v2(73.75,17.75)
GPIO2: JP1-4.2 R1-8.2 U1-3.8 | length 83.3
  Top Layer w0.2: U1-3.8 v2(73.75,18.75) 76,18.75 76.75,19.5 R1-8.2
  Layer 1 w0.2: JP1-4.2 36.02,72.73 36.5,72.25 36.5,69 37.5,68 48.816,68 73.75,43.066 v2(73.75,18.75)
GPIO3: JP1-4.3 Q1-2.1 R1-6.2 | length 25.8
  Top Layer w0.2: v2(55.75,71.25) 57.225,71.25 R1-6.2 58,71.275 58.175,71.45 Q1-2.1
  Layer 1 w0.2: JP1-4.3 36.23,75.27 37.5,74 51.5,74 54.25,71.25 v2(55.75,71.25)
GPIO4: JP1-4.4 Q1-1.1 R1-5.2 | length 24.8
  Top Layer w0.2: JP1-4.4 36.06,77.81 36.095,77.775 37.18,78.86 51.39,78.86 52.475,77.775 R1-5.2 57.775,77.775 57.95,77.95 Q1-1.1
GPIO5: JP1-5.1 Q1-3.1 R1-7.2 | length 23.4
  Top Layer w0.2: JP1-5.1 50.56,70.19 55.975,64.775 R1-7.2 58.025,64.775 58.2,64.95 Q1-3.1
GPIO6: JP1-5.2 R3-4.2 S3-1.1 | length 10.5
  Top Layer w0.2: JP1-5.2 39.27,72.73 40.04,71.96 S3-1.1 ; R3-4.2 v2(40.75,69)
  Bottom Layer w0.2: JP1-5.2 38.25,72.73 40.75,70.23 v2(40.75,69)
GPIO7: JP1-5.3 R3-3.2 S3-1.2 | length 14
  Top Layer w0.2: JP1-5.3 39.23,75.27 40,74.5 S3-1.2 ; R3-3.2 v2(42.5,69)
  Bottom Layer w0.2: JP1-5.3 38.25,75.27 42.5,71.02 v2(42.5,69) v2@42.5,68.75
GPIO8: JP1-5.4 R3-2.2 S3-1.3 | length 17.3
  Top Layer w0.2: JP1-5.4 39.19,77.81 39.96,77.04 S3-1.3 ; R3-2.2 v2(44.25,69)
  Bottom Layer w0.2: JP1-5.4 38.25,77.81 44.25,71.81 v2(44.25,69) v2@44.25,68.75
GR1: D3-1.4 D3-1.12 U3-2.1 | length 50.5
  Top Layer w0.2: U3-2.1 26.25,40.545 v2(26.25,41.5)
  Bottom Layer w0.2: v2(26.25,41.5) 26.25,34.5 27.5,33.25 36.5,33.25 38.28,35.03 56.03,35.03 57,36 D3-1.4 59.518,36.172 61.172,36.172 63.54,38.54 D3-1.12@65.966,38.54
GR2: D3-2.4 D3-2.12 U3-2.5 | length 61.5
  Top Layer w0.2: v2(24.75,30.5) 24.75,35.115 25,35.365 U3-2.5
  Bottom Layer w0.2: v2(24.75,30.5) 25.25,30.5 27.5,32.75 36.75,32.75 37.75,33.75 38.63,34.63 60.63,34.63 62,36 D3-2.4 71.75,36 74.29,38.54 D3-2.12@76.776,38.54
GR3: D3-3.4 D3-3.12 U3-2.6 | length 19.1
  Top Layer w0.2: U3-2.6 27.095,34.095 27.75,34.75 v2(27.75,36.5)
  Bottom Layer w0.2: v2(27.75,36.5) 28.25,36 D3-3.4 37,36 39.54,38.54 D3-3.12@41.966,38.54
GR4: D3-4.4 D3-4.12 U3-2.7 | length 31
  Top Layer w0.2: U3-2.7 26.171,32.846 27.346,32.846 28,33.5 v2(28,34)
  Layer 2 w0.2: v2(28,34) 28,33.25 28.5,32.75 36.75,32.75 40.08,36.08 D3-4.4
  Bottom Layer w0.2: D3-4.4 46.529,36.229 48.229,36.229 50.62,38.62 D3-4.12@53,38.62
IN5V: JP1-1.1 R1-1.1 U1-1.3 | length 8.3
  Top Layer w0.2: JP1-1.1 14.51,29.81 R1-1.1 14.7,31.975 U1-1.3
  other v1: 6,27.5 12,27.5 14.5,27.5 12,30
IN12V: JP1-2.1 R1-2.1 U1-2.3 | length 8.3
  Top Layer w0.2: JP1-2.1 14.51,12.81 R1-2.1 14.7,14.975 U1-2.3
  other v1: 6,10.5 11.5,10.5 14.5,10.5 11.5,14.5
IRQ: JP3-4.8
MISO: JP3-3.3 JP3-4.7 TP3-3.1 | length 68.4
  Layer 1 w0.2: JP3-3.3 7.08,60.25 8.13,61.3 34.7,61.3 TP3-3.1
  Layer 2 w0.2: TP3-3.1@36.25,59 TP3-3.1
  Bottom Layer w0.2: TP3-3.1 38.75,60.75 65.54,60.75 70.21,56.08 JP3-4.7
Monitor5V: R2-1.1 U1-1.1 | length 22.8
  Top Layer w0.2: U1-1.1 14.45,34.125 14.45,43.7 19.75,49 R2-1.1@25.25,49
Monitor12V: R2-2.1 U1-2.1 | length 49.7
  Top Layer w0.2: U1-2.1 6.55,16.95 4.5,19 4.5,40.75 6.75,43 12.25,43 17.75,48.5 R2-2.1
MOSI: JP3-3.4 JP3-4.6 TP3-4.1 | length 72
  Layer 1 w0.2: JP3-3.4 9.865,59.755 10.67,59.755 11.725,58.7 17.95,58.7 18.25,59 25.5,59 27,57.5 39.25,57.5 TP3-4.1
  Layer 2 w0.2: TP3-4.1@40,59 TP3-4.1
  Bottom Layer w0.2: TP3-4.1 40.75,55.5 41.93,54.32 56.68,54.32 58.75,52.25 72.75,52.25 73,52.5 JP3-4.6
N20: F1-1.2 JP1-17.2 | length 6.2
  Top Layer w0.75: F1-1.2 JP1-17.2
NetC1-1_2: C1-1.2 U1-3.17 | length 1.9
  Top Layer w0.2: C1-1.2 67.2,19.05 67.474,18.776 68.246,18.776 U1-3.17
NetD2-1_2: D2-1.2 D2-2.1 | length 2.7
  Top Layer w0.2: D2-2.1 D2-1.2
NetD2-2_2: D2-2.2 D2-3.1 | length 2.7
  Top Layer w0.2: D2-3.1 D2-2.2
NetD2-4_2: D2-4.2 D2-5.1 | length 2.7
  Top Layer w0.2: D2-5.1 D2-4.2
NetD2-5_2: D2-5.2 D2-6.1 | length 2.7
  Top Layer w0.2: D2-6.1 D2-5.2
NetF1-1_1: F1-1.1 Q1-1.3 | length 2.5
  Top Layer w0.2: Q1-1.3 F1-1.1
NetF1-2_1: F1-2.1 Q1-2.3 | length 2.5
  Top Layer w0.2: Q1-2.3 F1-2.1
NetF1-3_1: F1-3.1 Q1-3.3 | length 2.5
  Top Layer w0.2: Q1-3.3 F1-3.1
NetFB1-1_2: FB1-1.2 JP1-20.1
  other v1: 42.5,12 46,12 46,15
NetR1-3_1: R1-3.1 U1-3.16 | length 3.1
  Top Layer w0.2: R1-3.1 66.5,20.399 67.649,19.25 U1-3.16
NetR1-4_2: R1-4.2 U1-3.11 | length 2
  Top Layer w0.2: U1-3.11 71.775,20.298 R1-4.2
NetU3-1_1: U3-1.1 U3-2.3 | length 19.8
  Top Layer w0.2: U3-2.3 27.155,37.905 27.5,38.25 27.5,41.7 36.8,51 U3-1.1
NetU3-1_8: U3-1.8 U3-2.2 | length 30.3
  Top Layer w0.2: v2(24.75,41.75) 24.75,40.025 25.6,39.175 U3-2.2 ; U3-1.8 v2(43.75,51)
  Bottom Layer w0.2: v2(24.75,41.75) 25.25,41.75 29.5,46 41.75,46 43.75,48 v2(43.75,51)
PWM1: JP1-6.1 JP1-7.2 | length 14.2
  Layer 1 w0.2: JP1-6.1 2,64.25 3.75,66 3.75,74.5 3.25,75 JP1-7.2
PWM2: JP1-6.2 JP1-8.2 JP1-9.2 | length 17.2
  Layer 1 w0.2: JP1-6.2 4.54,74.54 5,75 JP1-8.2 JP1-9.2
PWM3: JP1-6.3 JP1-11.2 | length 15.7
  Layer 1 w0.2: JP1-6.3 7.08,64.33 12,69.25 12,74.5 12.5,75 JP1-11.2
PWM4: JP1-6.4 JP1-12.2 | length 16.3
  Layer 1 w0.2: JP1-6.4 9.62,65.12 16,71.5 16,74.5 16.5,75 JP1-12.2
PWM5: JP1-6.5 JP1-13.2 JP1-14.2 | length 21
  Layer 1 w0.2: JP1-6.5 12.16,64.16 20,72 20,74.5 20.5,75 JP1-13.2 JP1-14.2
PWM6: JP1-6.6 JP1-10.1 | length 25.3
  Layer 1 w0.2: JP1-6.6 30.25,63 31,63.75 JP1-10.1
Recoil: F1-2.2 JP1-15.2 | length 6.4
  Top Layer w0.2: F1-2.2@68.286,70 F1-2.2@68.786,70.5
  Top Layer w0.75: F1-2.2@68.786,70.5 JP1-15.2
SCK: JP3-3.2 JP3-4.5 TP3-5.1 | length 71.2
  Top Layer w0.2: JP3-3.2 4.54,58.96 4.999,58.501 26.499,58.501 27.5,57.5 43.25,57.5 TP3-5.1
  Layer 1 w0.2: v2(62.5,59) 67.96,53.54 JP3-4.5
  Layer 2 w0.2: TP3-5.1@44,59 TP3-5.1
  Bottom Layer w0.2: TP3-5.1 v2(62.5,59)
SCL: JP3-2.2 JP3-5.3 TP3-2.1 U3-1.5 | length 55
  Top Layer w0.2: U3-1.5 v2(42.75,49.5) 50.5,49.5 51.73,50.73 JP3-5.3
  Layer 1 w0.2: JP3-2.2 5,57 6.3,58.3 18.8,58.3 19,58.5 23.25,58.5 TP3-2.1 36,57 42.75,50.25 v2(42.75,49.5)
SDA: JP3-2.1 JP3-5.4 TP3-1.1 U3-1.4 | length 57.3
  Top Layer w0.2: U3-1.4 39.588,49.5 39.838,49.25 v2(40,49.25) 40.09,49.25 40.54,48.8 50.45,48.8 51.06,48.19 JP3-5.4
  Layer 1 w0.2: JP3-2.1 2.805,57 4.105,55.7 19.45,55.7 TP3-1.1 22.25,57 23.75,55.5 29.25,55.5 35.5,49.25 v2(40,49.25)
SG1: D3-1.14 D3-2.14 D3-3.14 D3-4.14 U3-2.8 | length 70.4
  Top Layer w0.2: U3-2.8 28.305,31.555 28.7,31.95 28.7,42.334 31.366,45 v2(33.5,45)
  Bottom Layer w0.2: v2(33.5,45) 43,45 ; D3-3.14@42.716,43.62 D3-3.14 42.966,44.966 43,45 ; D3-4.14 54,45.5 ; D3-1.14 66.966,45.466 67,45.5 ; D3-2.14 77.776,44.974 77.25,45.5 67,45.5 ; 43,45 43.5,45.5 54,45.5 ; 54,45.5 67,45.5
SG2: D3-1.13 D3-2.13 D3-3.13 D3-4.13 U3-2.9 | length 65.8
  Top Layer w0.2: v2(30,42.5) 29.25,41.75 29.25,32 29.695,31.555 U3-2.9 ; D3-3.13 44.17,41.08 45.5,39.75 66.966,39.75 ; 53.992,39.78 54,39.787 D3-4.13 ; D3-1.13 66.966,39.75 ; D3-2.13 76.33,41.08 75,39.75 66.966,39.75
  Bottom Layer w0.2: v2(30,42.5) 41.296,42.5 42.716,41.08 D3-3.13
SG3: D3-1.8 D3-2.8 D3-3.8 D3-4.8 U3-2.11 | length 59.3
  Top Layer w0.2: v2(30.287,34.11) 31.835,34.11 U3-2.11 ; D3-3.8 42.966,26.784 43.5,26.25 77.25,26.25 77.776,26.776 D3-2.8 ; D3-4.8 54,26.328 54.022,26.305 ; D3-1.8 66.966,26.281 66.972,26.275
  Layer 1 w0.2: v2(30.287,34.11) 35.39,34.11 41.12,28.38 D3-3.8
SG4: D3-1.7 D3-2.7 D3-3.7 D3-4.7 U3-2.12 | length 52
  Top Layer w0.2: U3-2.12 32.885,35.365 34,34.25 34,30.25 35.346,28.904 D3-3.7
  Bottom Layer w0.2: D3-3.7 35.346,26.654 35.75,26.25 69.75,26.25 70.156,26.656 D3-2.7 ; 46.38,26.25 D3-4.7 ; 59.346,26.25 D3-1.7
SG5: D3-1.6 D3-2.6 D3-3.6 D3-4.6 U3-2.13 | length 50.9
  Top Layer w0.2: U3-2.13 32.865,36.635 35.346,34.154 D3-3.6 ; D3-4.6 46.38,32.63 46.75,33 69.75,33 70.156,32.594 D3-2.6 ; D3-1.6 59.346,32.968 59.377,32.999
  Layer 2 w0.2: D3-3.6 36.92,30.92 39,33 46,33 46.38,32.62 D3-4.6
SG6: D3-1.1 D3-2.1 D3-3.1 D3-4.1 U3-2.14 | length 52
  Top Layer w0.2: U3-2.14 31.3,37.905 30.3,38.905 30.3,41.035 32.885,43.62 D3-3.1 35.346,45.096 35.75,45.5 69.75,45.5 70.156,45.094 D3-2.1 ; D3-4.1 46.38,45.453 46.394,45.467 ; 53.905,45.525 53.914,45.515 ; 59.345,45.488 59.346,45.487 D3-1.1
SG7: D3-1.2 D3-2.2 D3-3.2 D3-4.2 U3-2.15 | length 46.4
  Top Layer w0.2: U3-2.15 31.3,39.175 30.7,39.775 30.7,40.869 30.911,41.08 D3-3.2
  Layer 2 w0.2: D3-3.2 37.17,41.08 38.5,39.75 69.75,39.75 70.156,40.156 D3-2.2 ; D3-4.2 46.38,39.784 46.401,39.763 ; 59.346,39.788 D3-1.2
SG8: D3-1.9 D3-2.9 D3-3.9 D3-4.9 U3-2.16 | length 58
  Top Layer w0.2: U3-2.16 33.191,40.445 42.716,30.92 D3-3.9
  Bottom Layer w0.2: D3-3.9 42.966,32.716 43.25,33 54,33 ; D3-4.9 54,33 ; D3-1.9 66.966,33 ; D3-2.9 78,31.144 78,32.5 77.5,33 66.966,33 ; 54,33 66.966,33
pads on no net: JP1-10.2 JP3-2.3 JP3-3.5 U1-3.10 U1-3.14 U1-3.15

## Polygon pours and split planes (outlines as drawn)
GND on Layer 1 "GND_L1" (solid, remove dead copper, pour order 50): 0,0 80,0 80,80 0,80
12V on Layer 1 "12V_L02_P047" (solid, pour order 47): 71.75,69.5 77.75,69.5 77.75,59.75 71.75,59.75
IN5V on Layer 1 "IN5V_Poly" (solid, remove dead copper, pour order 30): 15.5,31 5.25,31 5.25,26.25 15.5,26.25
12V on Layer 1 "12V_Poly" (solid, pour order 29): 16.5,14 16.5,5 29.25,5 29.25,14
FlywheelH on Layer 1 "FlyWheelH_Poly" (solid, pour order 27): 71.25,17 78.25,17 78.25,2.5 71.25,2.5
NetFB1-1_2 on Layer 1 "FB_Poly" (solid, remove dead copper, pour order 26): 41.5,16.25 47,16.25 47,5.75 41.5,5.75
IN12V on Layer 1 "IN12V_Poly" (solid, remove dead copper, pour order 25): 15.5,15.5 15.5,9.25 5.25,9.25 5.25,15.5
FlywheelL on Layer 1 "Flywheel_Poly" (solid, pour order 24): 61.75,17 68.75,17 68.75,2.5 61.75,2.5
5V on Layer 1 "5V_L02_P013" (solid, pour order 13): 1,73.75 28,73.75 28,65.5 1,65.5
GND on Layer 1 "GND_L02_P005" (solid, pour order 5): 68.9,17 68.9,19.5 71.1,19.5 71.1,17
5V on Layer 1 "5V_L02_P014" (solid, remove dead copper, pour order 14): 73,25.25 73,17.25 17.75,17.25 17.75,25.25
12V on Layer 1 "Multi-Layer-12V" (solid, pour order 28): 40.5,15.75 40.5,13.25 16.5,13.25 16.5,15.75
GND on Layer 2 "GND_L2" (solid, pour order 52): 0,0 80,0 80,80 0,80
12V on Layer 2 "12V_L03_P048" (solid, pour order 48): 71.75,69.5 77.75,69.5 77.75,59.75 71.75,59.75
IN5V on Layer 2 "IN5V_Poly" (solid, remove dead copper, pour order 37): 15.5,31 5.25,31 5.25,26.25 15.5,26.25
12V on Layer 2 "12V_Poly" (solid, pour order 36): 16.5,14 16.5,5 29.25,5 29.25,14
FlywheelH on Layer 2 "FlyWheelH_Poly" (solid, pour order 34): 71.25,17.25 78.25,17.25 78.25,2.5 71.25,2.5
NetFB1-1_2 on Layer 2 "FB_Poly" (solid, remove dead copper, pour order 33): 41.5,16.25 47,16.25 47,5.75 41.5,5.75
IN12V on Layer 2 "IN12V_Poly" (solid, remove dead copper, pour order 32): 15.5,15.5 15.5,9.25 5.25,9.25 5.25,15.5
FlywheelL on Layer 2 "Flywheel_Poly" (solid, pour order 31): 61.75,17.25 68.75,17.25 68.75,2.5 61.75,2.5
5V on Layer 2 "5V_L03_P009" (solid, remove dead copper, pour order 9): 1,73.75 1,69.5 28,69.5 28,73.75
GND on Layer 2 "GND_L03_P006" (solid, pour order 6): 68.9,17 68.9,19.5 71.1,19.5 71.1,17
5V on Layer 2 "5V_L03_P015" (solid, pour order 15): 73,25.25 73,17.25 17.75,17.25 17.75,25.25
12V on Layer 2 "Multi-Layer-12V" (solid, pour order 35): 40.5,15.75 40.5,13.25 16.5,13.25 16.5,15.75
GND on Bottom Layer "GND_Bot" (solid, remove dead copper, pour order 51): 0,0 80,0 80,80 0,80
12V on Bottom Layer "12V_L04_P045" (solid, pour order 45): 71.75,69.5 77.75,69.5 77.75,59.75 71.75,59.75
IN5V on Bottom Layer "IN5V_Poly" (solid, remove dead copper, pour order 44): 15.5,31 5.25,31 5.25,26.25 15.5,26.25
12V on Bottom Layer "12V_Poly" (solid, pour order 43): 16.5,14 16.5,5 29.25,5 29.25,14
FlywheelH on Bottom Layer "FlyWheelH_Poly" (solid, pour order 41): 71.25,17.25 78.25,17.25 78.25,2.5 71.25,2.5
NetFB1-1_2 on Bottom Layer "FB_Poly" (solid, remove dead copper, pour order 40): 41.5,16.25 47,16.25 47,5.75 41.5,5.75
IN12V on Bottom Layer "IN12V_Poly" (solid, remove dead copper, pour order 39): 15.5,15.5 15.5,9.25 5.25,9.25 5.25,15.5
FlywheelL on Bottom Layer "Flywheel_Poly" (solid, pour order 38): 61.75,17.25 68.75,17.25 68.75,2.5 61.75,2.5
5V on Bottom Layer "5V_L04_P011" (solid, remove dead copper, pour order 11): 1,73.75 28,73.75 28,65.5 1,65.5
5V on Bottom Layer "5V_L04_P010" (solid, remove dead copper, pour order 10): 76,75.75 76,71.75 68.25,71.75 68.25,75.75
GND on Bottom Layer "GND_L04_P004" (solid, pour order 4): 68.9,17 68.9,19.5 71.1,19.5 71.1,17
5V on Bottom Layer "5V_L04_P012" (solid, remove dead copper, pour order 12): 73.25,25.232 73.25,17.25 19.75,17.25 19.75,21 19.75,25.232
12V on Bottom Layer "Multi-Layer-12V" (solid, pour order 42): 40.5,15.75 40.5,13.25 16.5,13.25 16.5,15.75
GND on Top Layer "GND_Top" (solid, remove dead copper, pour order 46): 0,0 80,0 80,80 0,80
12V on Top Layer "12V_L01_P023" (solid, pour order 23): 71.75,69.5 77.75,69.5 77.75,59.75 71.75,59.75
IN5V on Top Layer "IN5V_Poly" (solid, remove dead copper, pour order 22): 15.5,31 5.25,31 5.25,26.25 15.5,26.25
12V on Top Layer "12V_Poly" (solid, pour order 21): 16.5,14 16.5,5 29.25,5 29.25,14
12V on Top Layer "Multi-Layer-12V" (solid, pour order 20): 40.5,15.75 40.5,13.25 16.5,13.25 16.5,15.75
FlywheelH on Top Layer "FlyWheelH_Poly" (solid, pour order 18): 71.25,17 78.25,17 78.25,2.5 71.25,2.5
5V on Top Layer "5V_L01_P017" (solid, pour order 17): 16,31 16,37 18.5,37 18.5,31
5V on Top Layer "5V_L01_P016" (solid, pour order 16): 16,31 21.75,31 21.75,17.25 16,17.25
5V on Top Layer "5V_L01_P008" (solid, remove dead copper, pour order 8): 73,25.25 73,17.25 17.75,17.25 17.75,25.25
5V on Top Layer "5V_L01_P003" (solid, remove dead copper, pour order 3): 0,73.75 28,73.75 28,68.25 0,68.25
NetFB1-1_2 on Top Layer "FB_Poly" (solid, remove dead copper, pour order 2): 41.5,16.25 47,16.25 47,5.75 41.5,5.75
IN12V on Top Layer "IN12V_Poly" (solid, remove dead copper, pour order 1): 15.5,15.5 15.5,9.25 5.25,9.25 5.25,15.5
FlywheelL on Top Layer "Flywheel_Poly" (solid, pour order 0): 61.75,17 68.75,17 68.75,2.5 61.75,2.5

## Other copper
Top Layer:
  pour cut-out: 70.85,22.9 71.15,22.9 71.15,22.75 70.85,22.75
  pour cut-out: 65.675,18.5 65.825,18.5 65.825,18.4 65.675,18.4
Layer 1:
  pour cut-out: 72.5,21.5 72.509,21.491 72.5,21.5 67.5,21.5 72.5,21.5 67.5,21.5

## Silkscreen, mask and mechanical layers (free items; w line width, h text height)
Top Overlay:
  text "Selection cible" at 52.501,78.75 h1.52 r270
  text "N20" at 78.5,77.25 h1.52 r270
  text "Recoil" at 78.5,71.25 h1.52 r270
  text "Servos" at 11.75,70 h1.5
  text "Fan" at 30,70 h1.5
  text "GPIO Beagle" at 32,66.25 h1.5
  text "Agitator" at 78.5,65.25 h1.52 r270
  text "PWM Beagle" at 16.25,63.25 h1.52
  text "MISO/MOSI/SCK" at 35.5,61.25 h1.5
  text "SPI Beagle" at 16.25,60.25 h1.52
  text "I2C Beagle" at 11.25,57.25 h1.52
  text "SDA/SCL" at 26.75,56.5 h1.5
  text "NRF24L01" at 67.75,55.5 h1.5 r270
  text "HuskyLens" at 55,55.25 h1.5 r270
  text "ADC 5V/12V" at 7,54 h1.5
  text "GND" at 28.75,53.25 h1.5
  text "3.3V" at 13.75,44.75 h1.52 r270
  text "5V" at 13.751,27.25 h1.52 r270
  text "Courant 5V" at 41.5,25.001 h1.52
  text "Courant 12V" at 65,25.001 h1.52
  text "BeagleBone" at 44.25,14 h1.52
  text "FlyWheels" at 61.5,14 h1.52
  text "Fan" at 29.25,13.75 h1.52
  text "12V" at 13.75,10.25 h1.52 r270
Bottom Overlay:
  drawing of 124 lines, arcs and shapes, not listed
  text "Champoux Xavier et Dionne Alexandre" at 48,1.5 h1.14
  text "Rev. A" at 58,1.5 h1.14
  text "Projet Guimbarde" at 78.5,1.5 h1.14
Board:
  the board outline again, w0.2
Drill Drawing:
  circle w0.254: c1354.767,1615.856 r0.538
  lines w0.25: 82.633,27.876 91.006,27.876 112.375,27.876 124.33,27.876 133.833,27.876 ; 82.633,31.876 91.006,31.876 112.375,31.876 124.33,31.876 133.833,31.876 ; 82.633,35.876 91.006,35.876 112.375,35.876 124.33,35.876 133.833,35.876 ; 82.633,39.876 91.006,39.876 112.375,39.876 124.33,39.876 133.833,39.876 ; 82.633,43.876 91.006,43.876 112.375,43.876 124.33,43.876 133.833,43.876 ; 82.633,47.876 91.006,47.876 112.375,47.876 124.33,47.876 133.833,47.876 ; 82.633,51.876 91.006,51.876 112.375,51.876 124.33,51.876 133.833,51.876 ; 82.633,55.876 91.006,55.876 112.375,55.876 124.33,55.876 133.833,55.876 ; 82.633,59.876 91.006,59.876 112.375,59.876 124.33,59.876 133.833,59.876 ; 82.633,63.876 91.006,63.876 112.375,63.876 124.33,63.876 133.833,63.876 ; 82.633,67.876 91.006,67.876 112.375,67.876 124.33,67.876 133.833,67.876 ; 82.633,71.876 91.006,71.876 112.375,71.876 124.33,71.876 133.833,71.876 ; 82.633,75.876 133.833,75.876 ; 91.006,79.876 91.006,23.876 ; 112.375,79.876 112.375,23.876 ; 124.33,79.876 124.33,23.876 ; 1353.235,1609.749 1423.112,1609.749 ; 1353.235,1624.276 1423.112,1624.276 ; 1359.464,1607.328 1359.464,1626.697 ; 1365.178,1607.328 1365.178,1626.697 ; 1375.871,1607.328 1375.871,1626.697 ; 1380.701,1607.328 1380.701,1626.697 ; 1387.734,1607.328 1387.734,1626.697 ; 1401.046,1607.328 1401.046,1626.697 ; 1406.808,1607.328 1406.808,1626.697 ; 1414.337,1607.328 1414.337,1626.697 ; 91.006,23.876 82.633,23.876 82.633,79.876 133.833,79.876 133.833,23.876 124.33,23.876 ; 91.006,23.876 112.375,23.876 ; 112.375,23.876 124.33,23.876 ; 1353.235,1607.328 1423.112,1607.328 1423.112,1626.697 1353.235,1626.697 1353.235,1607.328
  lines w0.254: 1354.229,1610.476 1354.229,1610.745 1354.498,1611.014 1354.229,1611.283 1354.229,1611.552 1354.498,1611.552 1354.767,1611.283 1355.036,1611.552 1355.305,1611.552 1355.305,1611.283 1355.036,1611.014 1355.305,1610.745 1355.305,1610.476 1355.036,1610.476 1354.767,1610.745 1354.498,1610.476 1354.229,1610.476 ; 1354.229,1612.897 1355.305,1612.897 1355.305,1613.973 1354.229,1613.973 1354.229,1612.897 ; 1354.229,1618.815 1355.305,1618.815 1354.767,1617.739 1354.229,1618.815 ; 1354.229,1620.429 1354.498,1620.429 1354.498,1620.16 1355.036,1620.16 1355.036,1620.429 1355.305,1620.429 1355.305,1620.967 1355.036,1620.967 1355.036,1621.236 1354.498,1621.236 1354.498,1620.967 1354.229,1620.967 1354.229,1620.429 ; 1354.229,1622.85 1354.498,1622.85 1354.767,1622.581 1355.036,1622.85 1355.305,1622.85 1355.036,1623.119 1355.305,1623.388 1355.036,1623.388 1354.767,1623.657 1354.498,1623.388 1354.229,1623.388 1354.498,1623.119 1354.229,1622.85
  text "Symbol" at 1354.688,1625.002 h1.4
  text "Count" at 1360.19,1625.002 h1.4
  text "Hole Size" at 1365.904,1625.002 h1.4
  text "Plated" at 1376.597,1625.002 h1.4
  text "Hole Type" at 1381.427,1625.002 h1.4
  text "Drill Layer Pair" at 1388.46,1625.002 h1.4
  text "Via/Pad" at 1401.772,1625.002 h1.4
  text "Pad Shape" at 1407.534,1625.002 h1.4
  text "Hole Length" at 1415.063,1625.002 h1.4
  text "21" at 1360.19,1622.581 h1.17
  text "0,300mm (11,81mil)" at 1365.904,1622.581 h1.17
  text "PTH" at 1376.597,1622.581 h1.17
  text "Round" at 1381.427,1622.581 h1.17
  text "Top Layer - Bottom Layer" at 1388.46,1622.581 h1.17
  text "Via" at 1401.772,1622.581 h1.17
  text "Rounded" at 1407.534,1622.581 h1.17
  text "-" at 1415.063,1622.581 h1.17
  text "110" at 1360.19,1620.16 h1.17
  text "0,400mm (15,75mil)" at 1365.904,1620.16 h1.17
  text "PTH" at 1376.597,1620.16 h1.17
  text "Round" at 1381.427,1620.16 h1.17
  text "Top Layer - Bottom Layer" at 1388.46,1620.16 h1.17
  text "Via" at 1401.772,1620.16 h1.17
  text "Rounded" at 1407.534,1620.16 h1.17
  text "-" at 1415.063,1620.16 h1.17
  text "109" at 1360.19,1617.739 h1.17
  text "1,000mm (39,37mil)" at 1365.904,1617.739 h1.17
  text "PTH" at 1376.597,1617.739 h1.17
  text "Round" at 1381.427,1617.739 h1.17
  text "Top Layer - Bottom Layer" at 1388.46,1617.739 h1.17
  text "(Mixed)" at 1401.772,1617.739 h1.17
  text "(Mixed)" at 1407.534,1617.739 h1.17
  text "-" at 1415.063,1617.739 h1.17
  text "13" at 1360.19,1615.318 h1.17
  text "1,500mm (59,06mil)" at 1365.904,1615.318 h1.17
  text "PTH" at 1376.597,1615.318 h1.17
  text "Round" at 1381.427,1615.318 h1.17
  text "Top Layer - Bottom Layer" at 1388.46,1615.318 h1.17
  text "(Mixed)" at 1401.772,1615.318 h1.17
  text "(Mixed)" at 1407.534,1615.318 h1.17
  text "-" at 1415.063,1615.318 h1.17
  text "8" at 1360.19,1612.897 h1.17
  text "1,600mm (62,99mil)" at 1365.904,1612.897 h1.17
  text "PTH" at 1376.597,1612.897 h1.17
  text "Round" at 1381.427,1612.897 h1.17
  text "Top Layer - Bottom Layer" at 1388.46,1612.897 h1.17
  text "Pad" at 1401.772,1612.897 h1.17
  text "Rounded" at 1407.534,1612.897 h1.17
  text "-" at 1415.063,1612.897 h1.17
  text "4" at 1360.19,1610.476 h1.17
  text "2,000mm (78,74mil)" at 1365.904,1610.476 h1.17
  text "PTH" at 1376.597,1610.476 h1.17
  text "Round" at 1381.427,1610.476 h1.17
  text "Top Layer - Bottom Layer" at 1388.46,1610.476 h1.17
  text "Pad" at 1401.772,1610.476 h1.17
  text "Rounded" at 1407.534,1610.476 h1.17
  text "-" at 1415.063,1610.476 h1.17
  text "265 Total" at 1360.19,1608.055 h1.17
  text "Layer" at 84.633,76.876 h2
  text "Name" at 93.006,76.876 h2
  text "Thickness" at 114.375,76.876 h2
  text "Gerber" at 126.33,76.876 h2
  text "Top Overlay" at 93.006,72.876 h2
  text "GTO" at 126.33,72.876 h2
  text "Top Solder" at 93.006,68.876 h2
  text "0,025mm" at 114.375,68.876 h2
  text "GTS" at 126.33,68.876 h2
  text "Top Surface Finish" at 93.006,64.876 h2
  text "0,020mm" at 114.375,64.876 h2
  text "1" at 84.633,60.876 h2
  text "Top Layer" at 93.006,60.876 h2
  text "0,035mm" at 114.375,60.876 h2
  text "GTL" at 126.33,60.876 h2
  text "Dielectric 2" at 93.006,56.876 h2
  text "0,099mm" at 114.375,56.876 h2
  text "2" at 84.631,52.876 h2
  text "Layer 1" at 93.006,52.876 h2
  text "0,015mm" at 114.375,52.876 h2
  text "G1" at 126.33,52.876 h2
  text "Dielectric 1" at 93.006,48.876 h2
  text "1,265mm" at 114.375,48.876 h2
  text "3" at 84.633,44.876 h2
  text "Layer 2" at 93.006,44.876 h2
  text "0,015mm" at 114.375,44.876 h2
  text "G2" at 126.33,44.876 h2
  text "Dielectric 3" at 93.006,40.876 h2
  text "0,099mm" at 114.375,40.876 h2
  text "4" at 84.633,36.876 h2
  text "Bottom Layer" at 93.006,36.876 h2
  text "0,035mm" at 114.375,36.876 h2
  text "GBL" at 126.33,36.876 h2
  text "Bottom Surface Finish" at 93.006,32.876 h2
  text "0,020mm" at 114.375,32.876 h2
  text "Bottom Solder" at 93.006,28.876 h2
  text "0,025mm" at 114.375,28.876 h2
  text "GBS" at 126.33,28.876 h2
  text "Bottom Overlay" at 93.006,24.876 h2
  text "GBO" at 126.33,24.876 h2
  text "Total board thickness:" at 84.633,20.876 h2
  text "1,655mm" at 114.375,20.876 h2

## Dimensions
0,80 to 80,80 on Drill Drawing
0,0 to 0,80 on Drill Drawing